# Altium PCB PCB1.PcbDoc (part 1 of 2)
Units mm, origin at the board's own origin, x right, y up, seen from the top; angles counter-clockwise.
Board outline 140 x 77.5 mm, 4 copper layers (Top Layer, GND, PWR, Bottom Layer), stack 1.626 mm thick; 200 components, 149 nets, 661 pads, 125 vias.
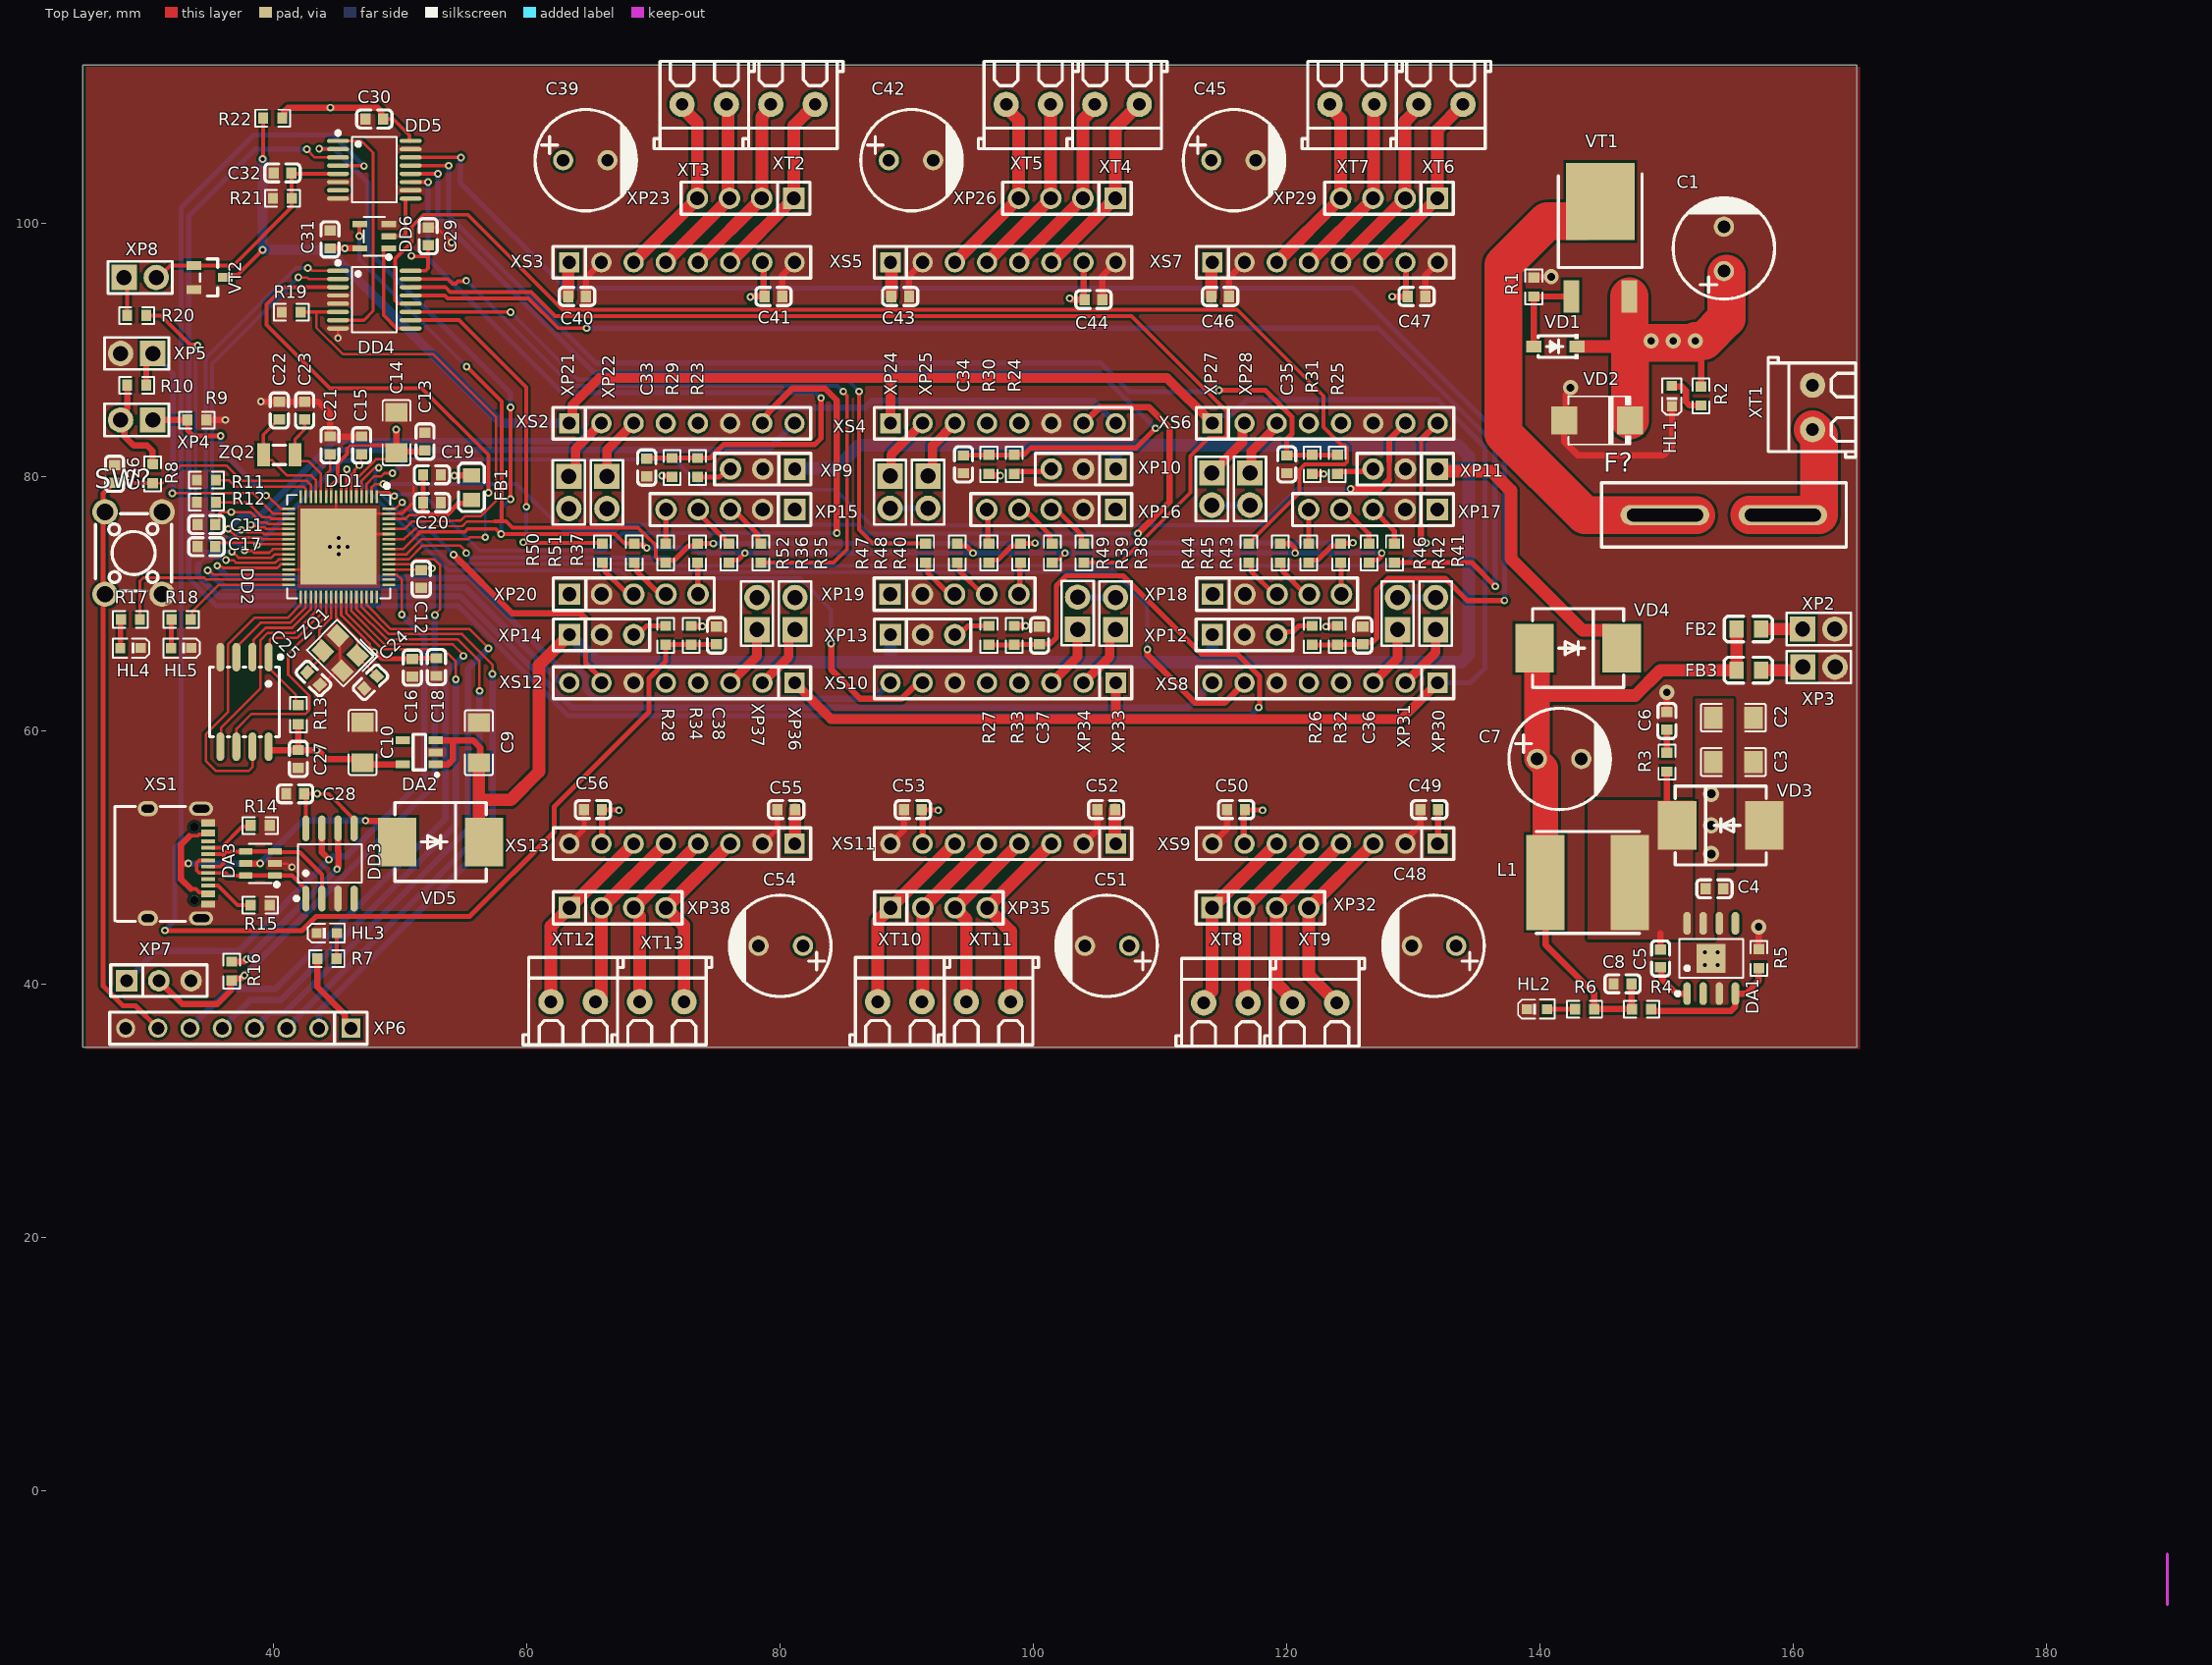
[diagram p0: Top Layer view]
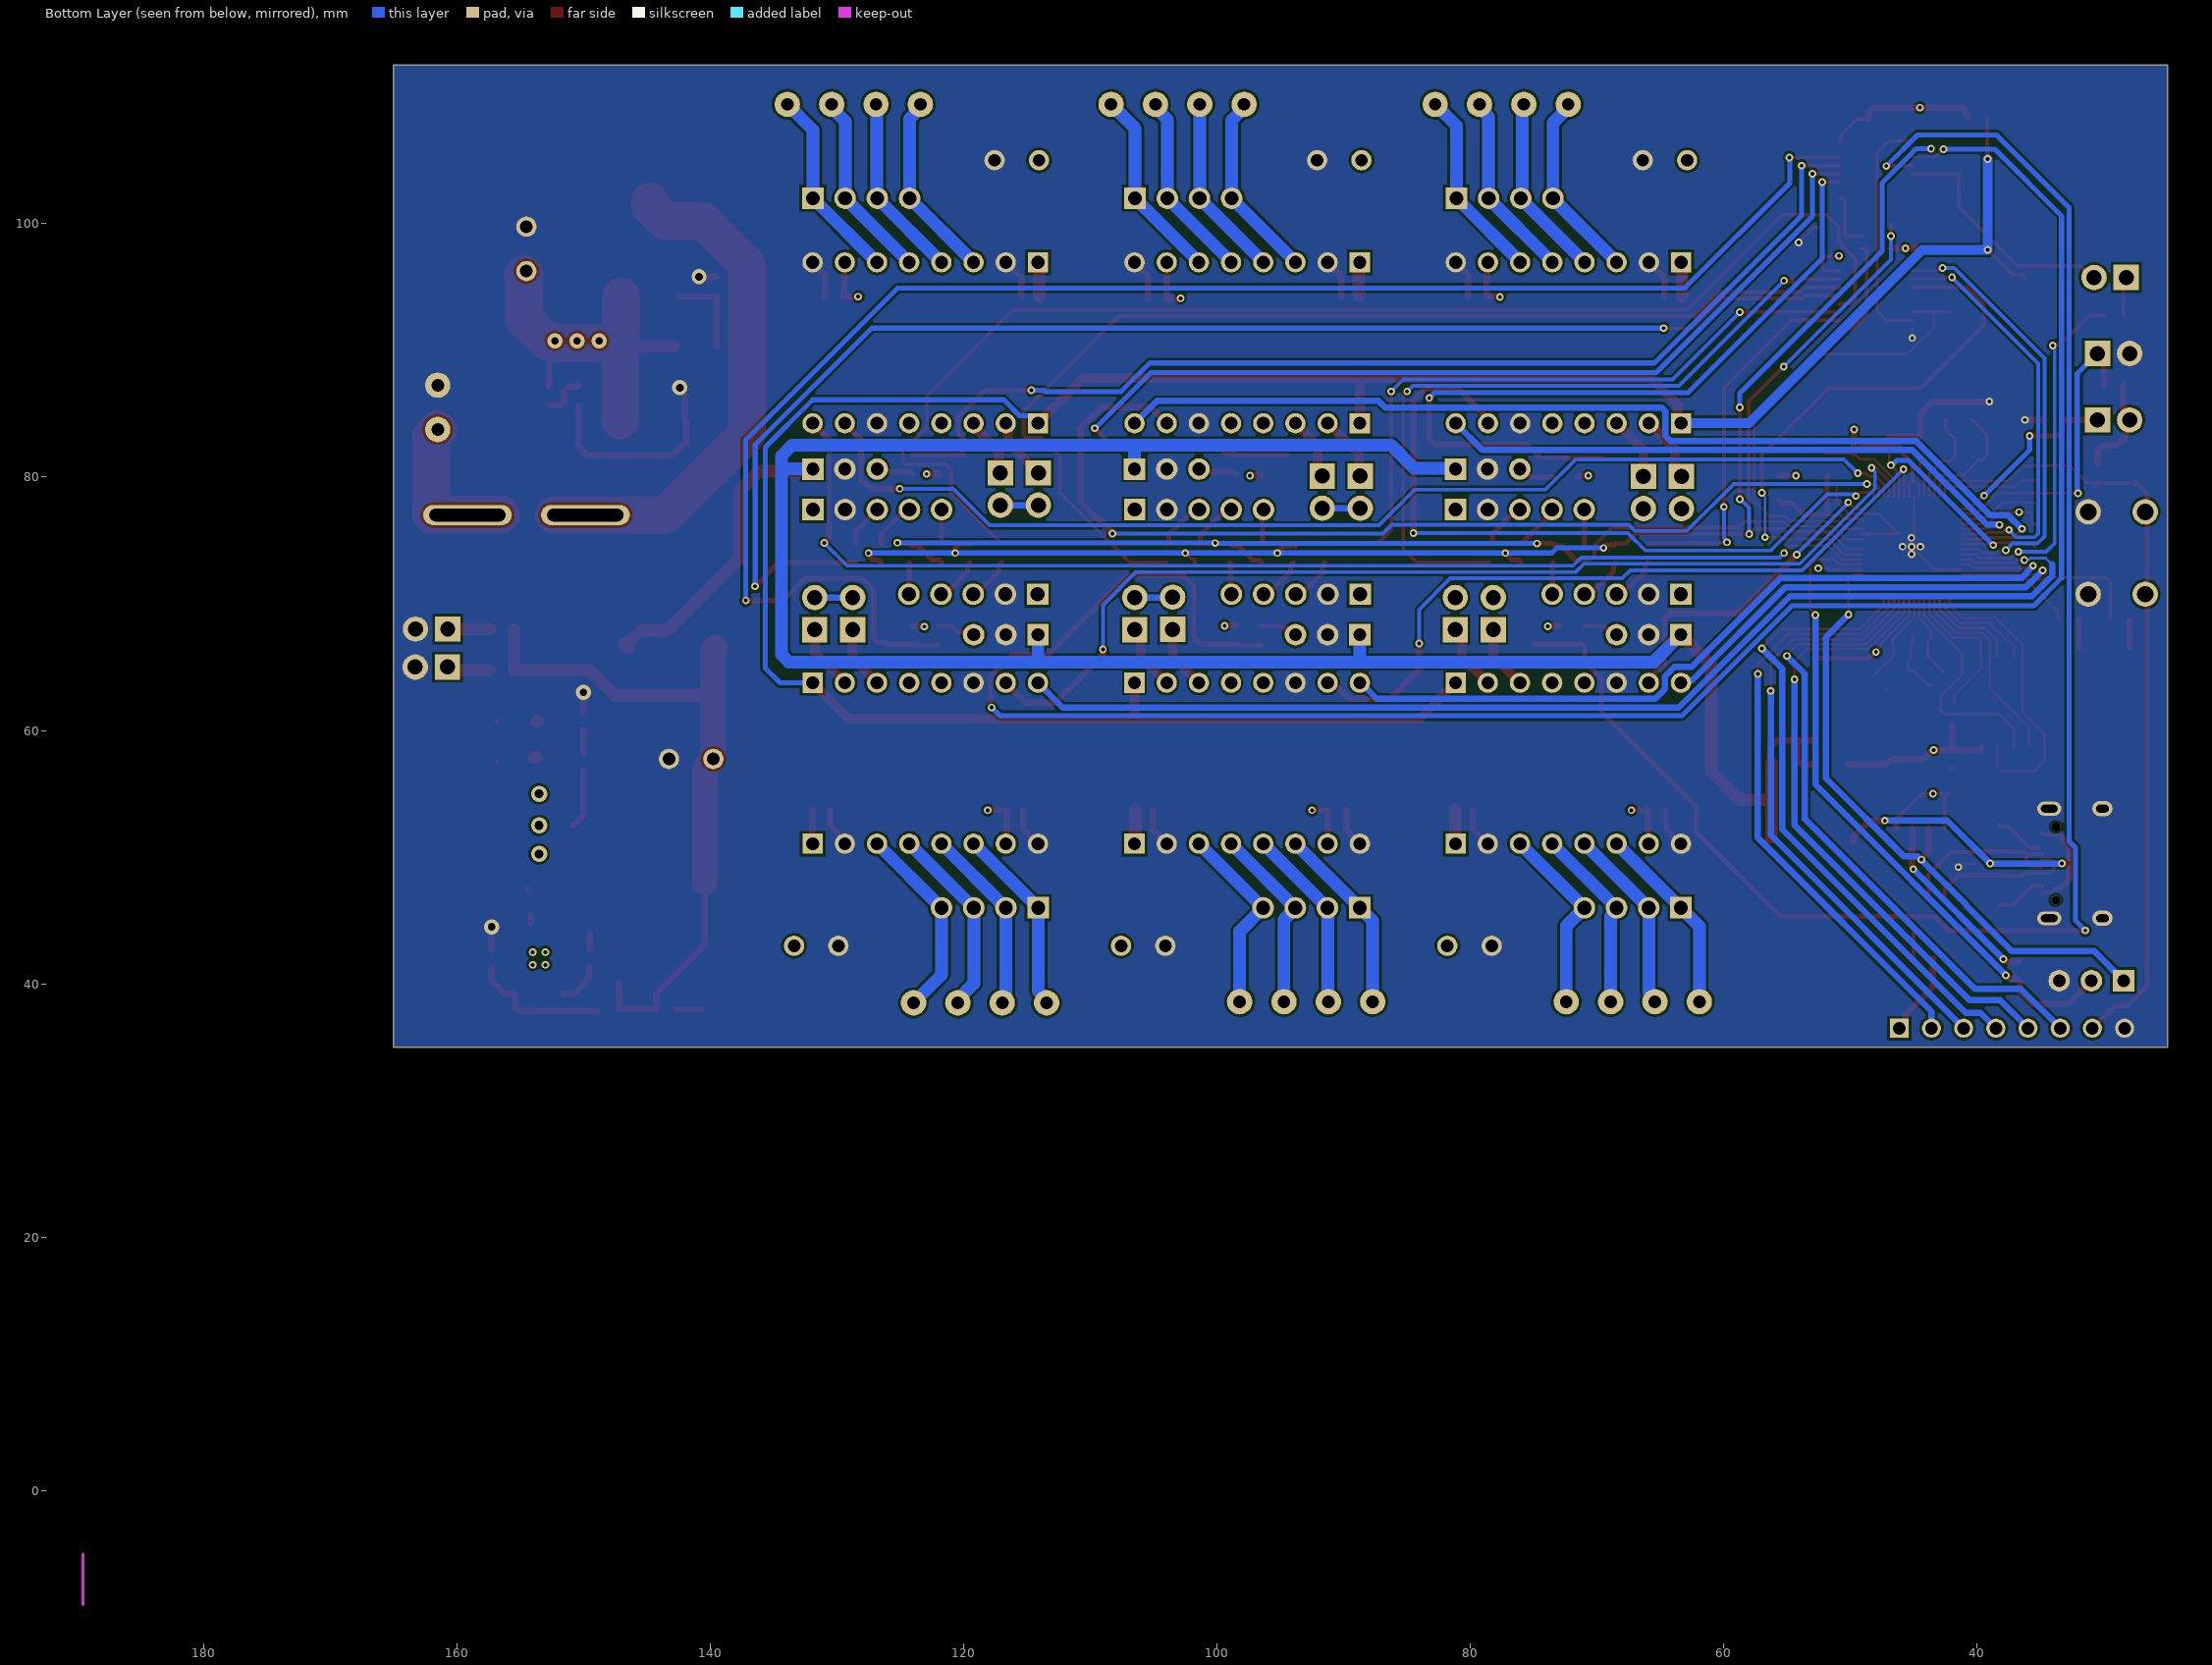
[diagram p1: Bottom Layer view, seen from below]
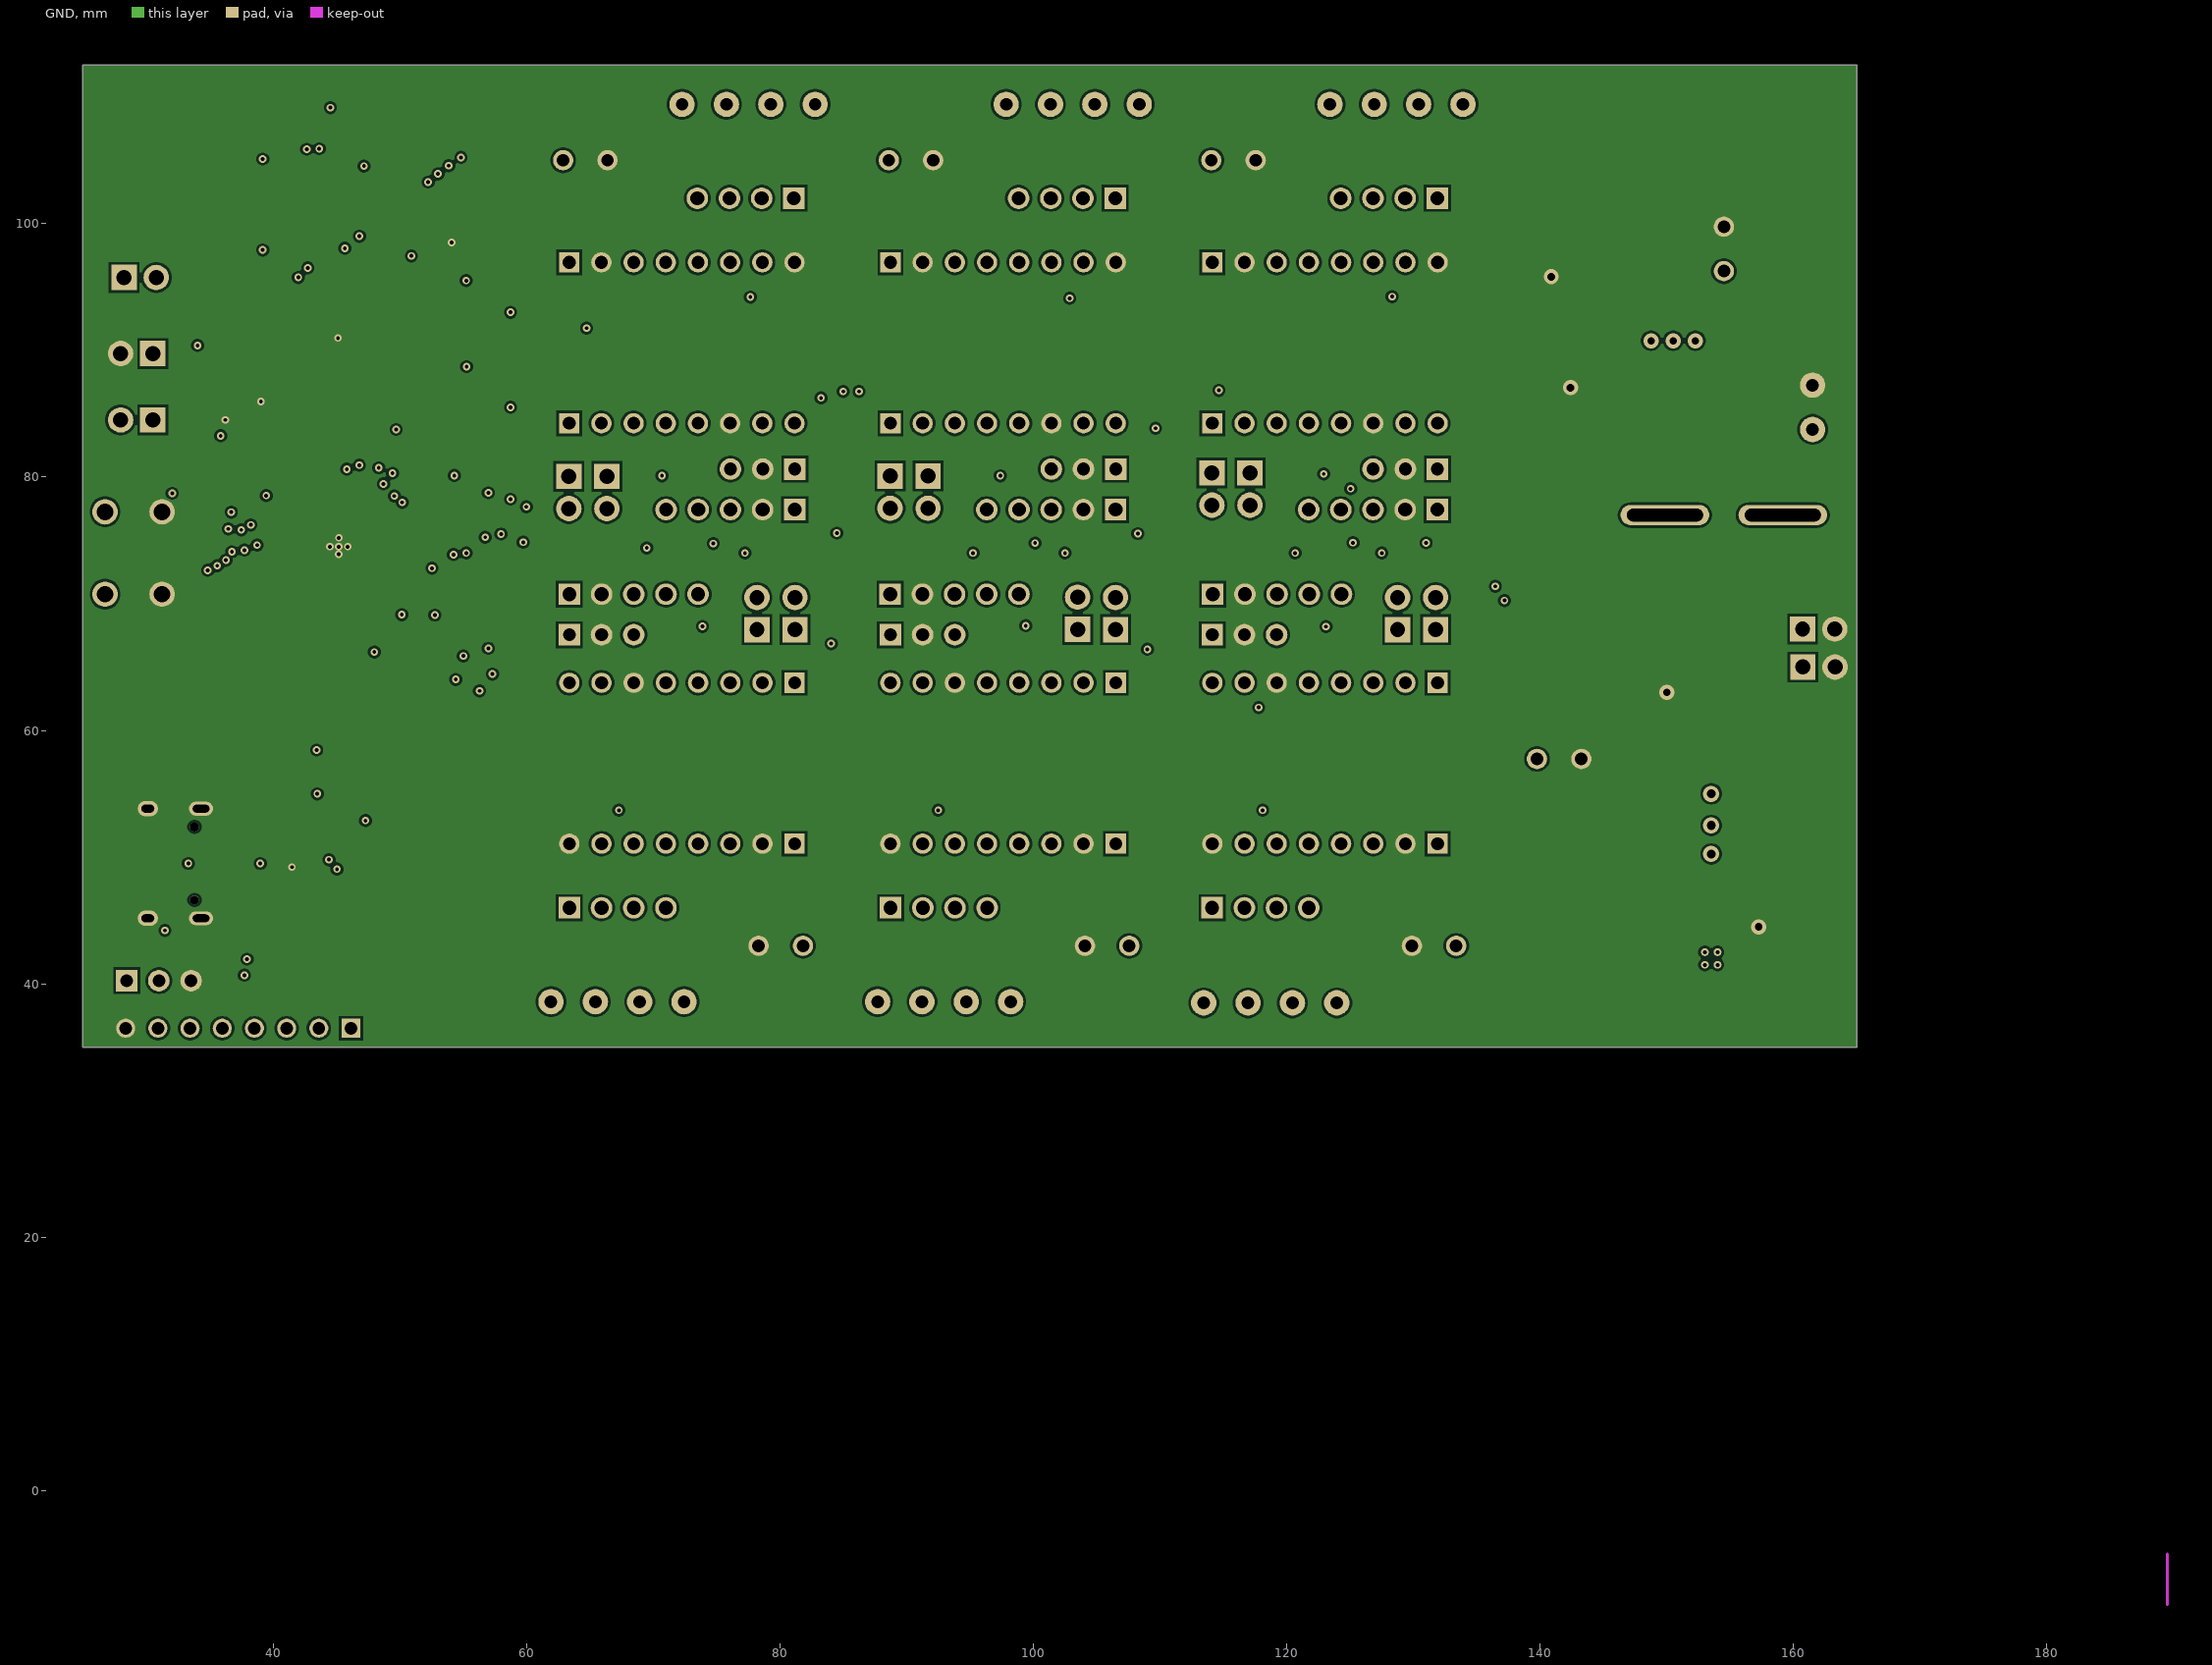
[diagram p2: GND]
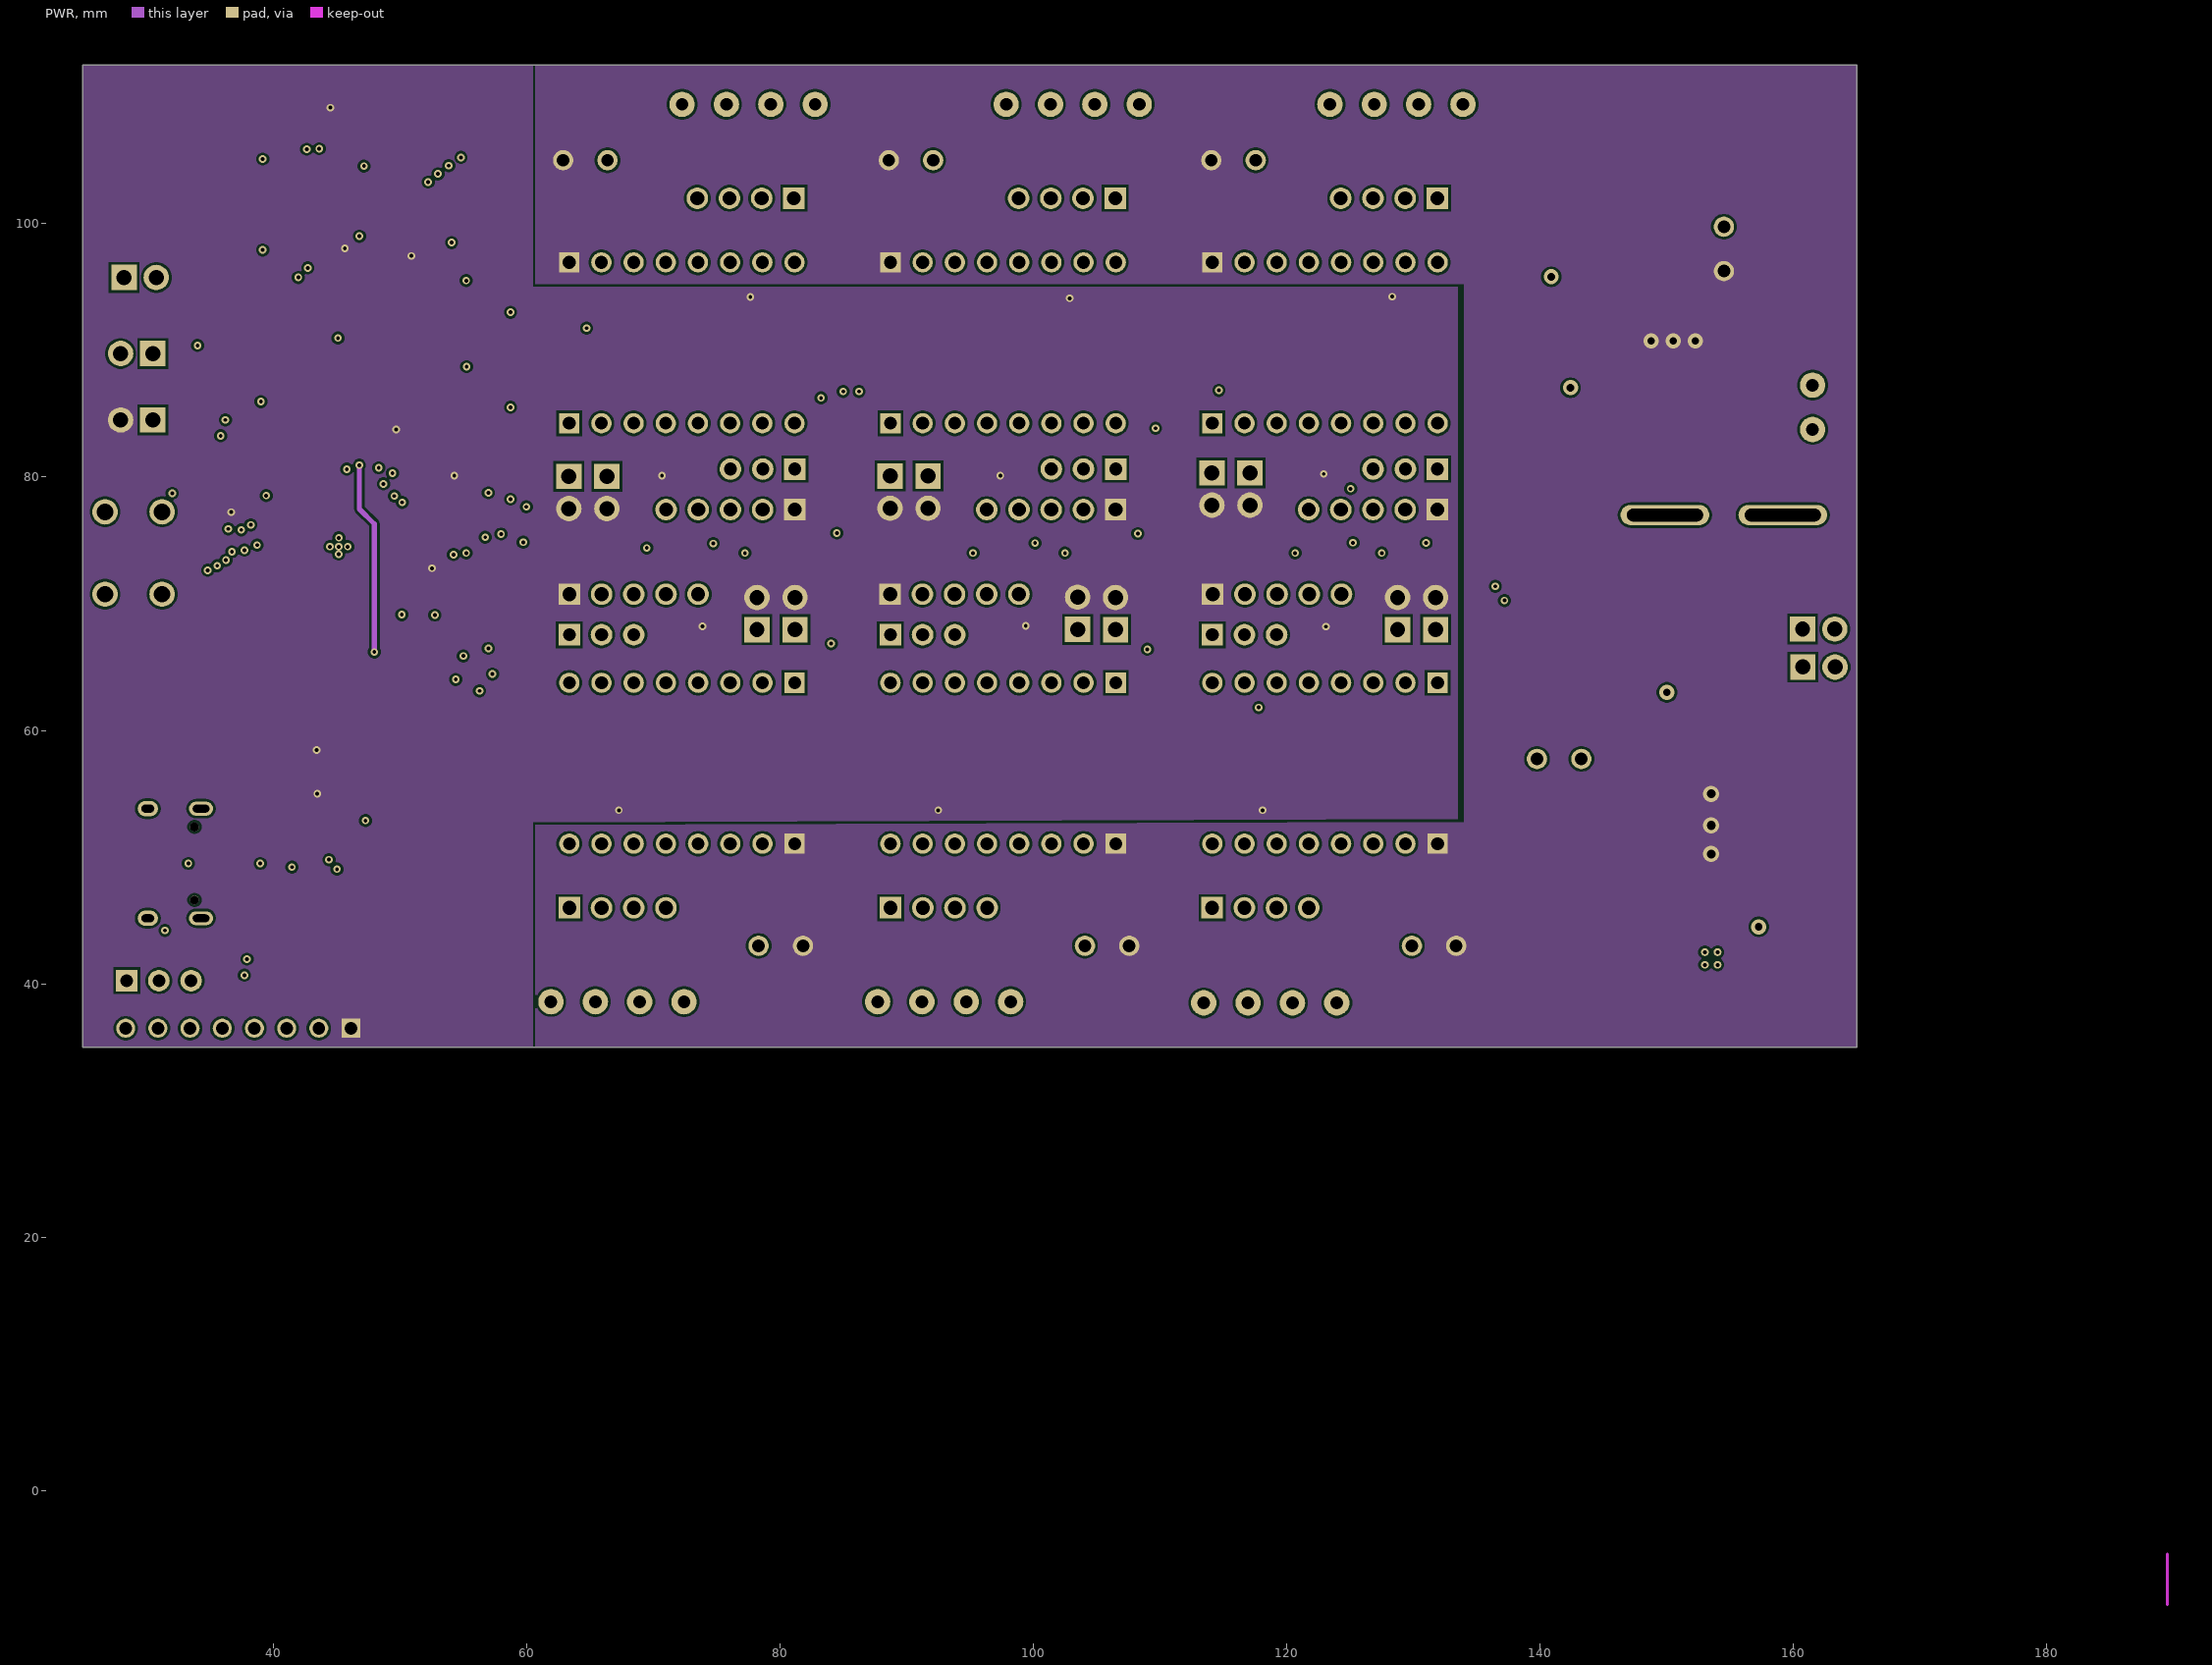
[diagram p3: PWR]
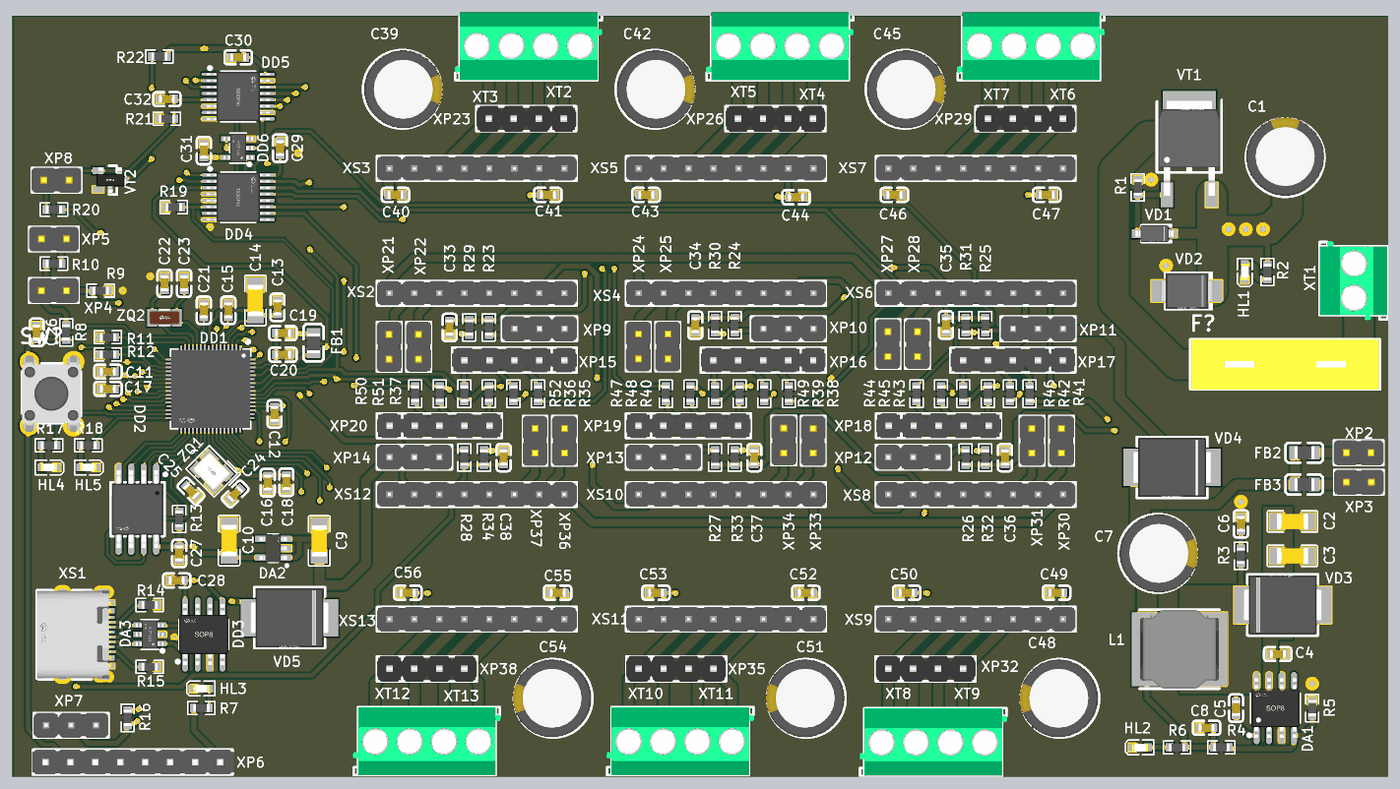
[diagram p5: 3D render of the assembled board from above, using the file's embedded part models]

## Layer stack, top to bottom
Top Solder: solder mask 0.0102, Solder Resist, Dk 3.5
Top Layer: signal copper 0.0356
Dielectric 3: prepreg 0.21, PP-006, Dk 4.1
GND: signal copper 0.035
Dielectric 2: prepreg 1.065, PP-006, Dk 4.1
PWR: signal copper 0.035
Dielectric 1: dielectric 0.21, FR-4, Dk 4.8
Bottom Layer: signal copper 0.0356
Bottom Solder: solder mask 0.0102, Solder Resist, Dk 3.5

## Board outline
25,112.5 165,112.5 165,35 25,35

## Design rules (kind name [scope] priority, off if disabled: settings)
Clearance CL_POWER [InNetClass('PWR24') Or InNetClass('MOTOR')] p1: gap=0.3 ignorepadtopadclearanceinfootprint=TRUE
Clearance [All] p2: gap=0.2 ignorepadtopadclearanceinfootprint=TRUE except(0.1: SMDPad-SMDPad)
ComponentClearance [All] p1: gap=0.25 collisioncheckmode=3 verticalgap=0.254 showdistances=FALSE
DiffPairsRouting [InDifferentialPair('USB')] p1: maxlimit=0.254 minlimit=0.2 mostfreqgap=0.254 toplayer_maxgap=0.2 toplayer_prefgap=0.2 toplayer_minwidth=0.327 toplayer_maxwidth=0.327 toplayer_prefwidth=0.327 impedanceprofiledriven=TRUE impedanceprofileid={DBED7915-1767-4A2F-BF62-6809FCF21FCF} impedanceprofilevalue=90.000000 maxuncoupledlength=12.7
PlaneClearance [All] p1: clearance=0.3
PlaneConnect [All] p1: planeconnectstyle=Direct reliefexpansion=0.25 reliefentries=4 reliefconductorwidth=0.3 reliefairgap=0.25
PolygonConnect [All] p1: connectstyle=Direct reliefconductorwidth=0.254 reliefentries=4 polygonreliefangle="90 Angle" airgapwidth=0.3
RoutingVias [All] p1: holewidth=0.3 width=0.6 viastyle="Through Hole" minholewidth=0.3 minwidth=0.6 maxholewidth=0.3 maxwidth=0.6
SilkToSilkClearance [All] p1: silktosilkclearance=0.01
SilkToSolderMaskClearance [IsPad] p1: minsilkscreentomaskgap=0.1 clearancetoexposedcopper=TRUE
SolderMaskExpansion [All] p1: expansion=0.102 istentingtop=FALSE
SupplyNets "Schematic Supply Nets_5" [InNet('+3V3')] p1: voltage=0.000
SupplyNets "Schematic Supply Nets_4" [InNet('+3V3A')] p2: voltage=0.000
SupplyNets "Schematic Supply Nets_3" [InNet('GND')] p3: voltage=0.000
SupplyNets "Schematic Supply Nets_2" [InNet('+5V')] p4: voltage=0.000
SupplyNets "Schematic Supply Nets_1" [InNet('+24V')] p5: voltage=0.000
SupplyNets "Schematic Supply Nets" [InNet('+5V_DC')] p6: voltage=0.000
Width W_GND [InNet('GND')] p1: maxlimit=2 minlimit=0.2 preferedwidth=0.5
Width W_PWR3 [InNetClass('PWR3')] p2: maxlimit=2 minlimit=0.2 preferedwidth=0.5
Width W_PWR5 [InNetClass('PWR5')] p3: maxlimit=2 minlimit=0.2 preferedwidth=0.8 toplayer_prefwidth=0.5 midlayer1_prefwidth=0.5 midlayer2_minwidth=0.4 bottomlayer_prefwidth=0.5 minimp=50.000000 maximp=50.000000 favimp=50.000000
Width W_MOTOR [InNetClass('MOTOR')] p4: maxlimit=2 minlimit=0.4 preferedwidth=1 midlayer2_minwidth=1 minimp=50.000000 maximp=50.000000 favimp=50.000000
Width W_PWR24 [InNetClass('PWR24')] p5: maxlimit=6 minlimit=0.4 preferedwidth=3 midlayer2_minwidth=1 minimp=50.000000 maximp=50.000000 favimp=50.000000
Width [All] p6: maxlimit=2 minlimit=0.2 preferedwidth=0.4 midlayer2_maxwidth=0.254 midlayer2_prefwidth=0.254 minimp=50.000000 maximp=50.000000 favimp=50.000000
24 further rules are at their usual default settings.

## Classes and differential pairs
component class 4_Drivers: C39 C40 C41 C42 C43 C44 C45 C46 C47 C48 C49 C50 C51 C52 C53 C54 C55 C56 XP21 XP22 XP23 XP24 XP25 XP26 XP27 XP28 XP29 XP30 XP31 XP32 XP33 XP34 XP35 XP36 XP37 XP38 XS2 XS3 XS4 XS5 XS6 XS7 XS8 XS9 XS10 XS11 XS12 XS13 XT2 XT3 XT4 XT5 XT6 XT7 XT8 XT9 XT10 XT11 XT12 XT13
component class 3_IO: C29 C30 C31 C32 C33 C34 C35 C36 C37 C38 DD4 DD5 DD6 R19 R20 R21 R22 R23 R24 R25 R26 R27 R28 R29 R30 R31 R32 R33 R34 R35 R36 R37 R38 R39 R40 R41 R42 R43 R44 R45 R46 R47 R48 R49 R50 R51 R52 VT2 XP8 XP9 XP10 XP11 XP12 XP13 XP14 XP15 XP16 XP17 XP18 XP19 XP20
component class 2_MCU: C11 C12 C13 C14 C15 C16 C17 C18 C19 C21 C22 C23 C24 C25 C26 C27 C28 DA3 DD1 DD2 DD3 HL4 HL5 R8 R9 R10 R11 R12 R13 R14 R15 R16 R17 R18 SW? XP4 XP5 XP6 XP7 XS1 ZQ1 ZQ2
component class 1_Power: C1 C2 C3 C4 C5 C6 C7 C8 C9 C10 DA1 DA2 F? FB1 FB2 FB3 HL1 HL2 HL3 L1 R1 R2 R3 R4 R5 R6 R7 VD1 VD2 VD3 VD4 VD5 VT1 XP2 XP3 XT1

## Components (designator, comment, footprint, x,y, rotation, side; value= is the part's Value field where it differs from the comment)
C1 "220u 35V" CAP-TH_BD8.0-P3.50-D0.5-FD 154.5,98 r90 top value=220uF
C2 "4.7u 50V" C1206 155.25,61 r0 top value=4.7uF
C3 "4.7u 50V" C1206 155.25,57.5 r0 top value=4.7uF
C4 "100n" C0603 153.75,47.5 r0 top
C5 "10n" C0603 149.5,42 r270 top
C6 "330p" C0603 150,60.75 r90 top
C7 "220u 35V" CAP-TH_BD8.0-P3.50-D0.5-FD 141.5,57.75 r0 top value=220uF
C8 "100n" C0603 146.5,40 r180 top
C9 "4.7u 50V" C1206 56.25,59.025 r90 top value=4.7uF
C10 "4.7u 50V" C1206 47.075,59.05 r90 top value=4.7uF
C11 "100n" C0603 34.75,76.25 r180 top
C12 "100n" C0603 51.7,71.95 r270 top
C13 "100n" C0603 52,82.8 r90 top
C14 "4.7u 50V" C1206 49.75,83.5 r90 top value=4.7uF
C15 "100n" C0603 47,82.5 r90 top
C16 "100n" C0603 51,64.95 r270 top
C17 "100n" C0603 34.75,74.5 r180 top
C18 "1u" C0603 52.9,65 r270 top
C19 "100n" C0603 52.55,80.175 r0 top
C20 "1u" C0603 52.55,77.975 r0 top
C21 "100n" C0603 44.5,82.5 r90 top
C22 "18p" C0603 40.5,85.25 r90 top
C23 "18p" C0603 42.5,85.25 r90 top
C24 "18p" C0603 47.7,63.8 r225 top
C25 "18p" C0603 43.2,64.1 r315 top
C26 "100n" C0603 27.5,80.25 r90 top
C27 "100n" C0603 42,57.75 r270 top
C28 "100n" C0603 41.75,55 r180 top
C29 "100n" C0603 52.25,99 r90 top
C30 "100n" C0603 48,108.25 r180 top
C31 "100n" C0603 44.5,98.75 r90 top
C32 "100n" C0603 40.75,104 r180 top
C33 "100n" C0603 69.5,80.75 r270 top
C34 "100n" C0603 94.5,80.995 r270 top
C35 "100n" C0603 120,81 r270 top
C36 "100n" C0603 126,67.5 r90 top
C37 "100n" C0603 100.5,67.5 r90 top
C38 "100n" C0603 75,67.5 r90 top
C39 "220u 35V" CAP-TH_BD8.0-P3.50-D0.5-FD 64.65,105 r0 top value=220uF
C40 "100n" C0603 64,94.25 r0 top
C41 "100n" C0603 79.5,94.25 r0 top
C42 "220u 35V" CAP-TH_BD8.0-P3.50-D0.5-FD 90.35,105 r0 top value=220uF
C43 "100n" C0603 89.5,94.25 r0 top
C44 "100n" C0603 104.75,94 r0 top
C45 "220u 35V" CAP-TH_BD8.0-P3.50-D0.5-FD 115.8,105 r0 top value=220uF
C46 "100n" C0603 114.75,94.25 r0 top
C47 "100n" C0603 130.25,94.25 r0 top
C48 "220u 35V" CAP-TH_BD8.0-P3.50-D0.5-FD 131.625,43 r180 top value=220uF
C49 "100n" C0603 131.25,53.75 r180 top
C50 "100n" C0603 116,53.75 r180 top
C51 "220u 35V" CAP-TH_BD8.0-P3.50-D0.5-FD 105.825,43 r180 top value=220uF
C52 "100n" C0603 105.75,53.75 r180 top
C53 "100n" C0603 90.5,53.75 r180 top
C54 "220u 35V" CAP-TH_BD8.0-P3.50-D0.5-FD 80.075,43 r180 top value=220uF
C55 "100n" C0603 80.5,53.75 r180 top
C56 "100n" C0603 65.25,53.75 r180 top
DA1 "TPS5450DDAR" SOP-8_L4.9-W3.9-P1.27-LS6.0-BL-EP 153.5,42 r0 top
DA2 "AP2112K-3.3" SOT-25-5_L2.9-W1.6-P0.95-LS2.8-BL 51.55,58.275 r90 top
DA3 "USBLC6-2SC6" SOT-23-6_L2.9-W1.6-P0.95-LS2.8-BL 39,49.5 r90 top
DD1 "MIK32 АМУР К1948ВК018" QFN-64_MCU32_PROD 45.187,74.5 r270 top
DD2 "W25Q32JVSSIQ" SOIC-8_L5.2-W5.2-P1.27-LS7.9-BL 37.75,62.25 r180 top
DD3 "CH340N" SOP-8_L5.0-W4.0-P1.27-LS6.0-BL 44.5,49.5 r0 top
DD4 "74HC138PW" TSSOP-16_L5.0-W4.4-P0.65-LS6.4-BL 48,94 r270 top
DD5 "74HC165PW" TSSOP-16_L5.0-W4.4-P0.65-LS6.4-BL 48,104.25 r270 top
DD6 "74LVC1G125" SOT-23-5_L3.0-W1.7-P0.95-LS2.8-BL 48,99 r90 top
F? "0287010.PXCN" FUSE-TH_L19.1-W5.1 154.5,77 r180 top
FB1 "220R" L0805 55.663,79.152 r270 top value=220Ω
FB2 "220R" L0805 156.466,68 r0 top value=220Ω
FB3 "220R" L0805 156.466,64.75 r0 top value=220Ω
HL1 "24V" LED0603-RD_GREEN 150.4,86.4 r90 top
HL2 "5V" LED0603-RD_GREEN 139.75,38 r0 top
HL3 "3.3V" LED0603-RD_GREEN 44.25,44 r0 top
HL4 "RUN" LED0603-RD_GREEN 28.75,66.5 r180 top
HL5 "ERR" LED0603-RD_GREEN 32.75,66.5 r180 top
L1 "22u" IND-SMD_L8.0-W8.0 143.75,48 r0 top value=22uH
R1 "10k" R0603 139.5,95 r90 top value=10kΩ
R2 "10k" R0603 152.7,86.4 r270 top value=10kΩ
R3 "5.6" R0603 150,57.5 r90 top value=10kΩ
R4 "10k" R0603 148,38 r0 top value=10kΩ
R5 "3.3k" R0603 157.25,42 r90 top value=10kΩ
R6 "1k" R0603 143.5,38 r180 top value=10kΩ
R7 "1k" R0603 44.25,42 r0 top value=10kΩ
R8 "10k" R0603 30.5,80.25 r90 top value=10kΩ
R9 "10k" R0603 34.003,84.5 r0 top value=10kΩ
R10 "10k" R0603 29.25,87.25 r180 top value=10kΩ
R11 "10k" R0603 34.75,79.75 r180 top value=10kΩ
R12 "10k" R0603 34.75,78 r180 top value=10kΩ
R13 "10k" R0603 42,61.25 r270 top value=10kΩ
R14 "5.1k" R0603 39,52.5 r0 top value=10kΩ
R15 "5.1k" R0603 39,46.2 r0 top value=10kΩ
R16 "1k" R0603 36.75,41.003 r270 top value=10kΩ
R17 "1k" R0603 28.75,68.75 r180 top value=10kΩ
R18 "1k" R0603 32.753,68.75 r180 top value=10kΩ
R19 "10k" R0603 41.447,93 r180 top value=10kΩ
R20 "1k" R0603 29.25,92.75 r180 top value=10kΩ
R21 "10k" R0603 40.75,102 r180 top value=10kΩ
R22 "10k" R0603 39.981,108.327 r0 top value=10kΩ
R23 "1k" R0603 73.5,80.75 r90 top value=10kΩ
R24 "1k" R0603 98.5,80.995 r90 top value=10kΩ
R25 "1k" R0603 124,81 r90 top value=10kΩ
R26 "1k" R0603 122,67.5 r270 top value=10kΩ
R27 "1k" R0603 96.5,67.5 r270 top value=10kΩ
R28 "1k" R0603 71,67.5 r270 top value=10kΩ
R29 "10k" R0603 71.5,80.75 r270 top value=10kΩ
R30 "10k" R0603 96.5,80.995 r270 top value=10kΩ
R31 "10k" R0603 122,81 r270 top value=10kΩ
R32 "10k" R0603 124,67.5 r90 top value=10kΩ
R33 "10k" R0603 98.5,67.5 r90 top value=10kΩ
R34 "10k" R0603 73,67.5 r90 top value=10kΩ
R35 "1k" R0603 78.5,74 r270 top value=10kΩ
R36 "1k" R0603 76,74 r270 top value=10kΩ
R37 "1k" R0603 71,74 r270 top value=10kΩ
R38 "1k" R0603 104,74 r270 top value=10kΩ
R39 "1k" R0603 101.5,74 r270 top value=10kΩ
R40 "1k" R0603 96.5,74 r270 top value=10kΩ
R41 "1k" R0603 128.5,74 r270 top value=10kΩ
R42 "1k" R0603 126.5,74 r270 top value=10kΩ
R43 "1k" R0603 121.75,74 r270 top value=10kΩ
R44 "1k" R0603 117,74 r90 top value=10kΩ
R45 "1k" R0603 119.5,74 r90 top value=10kΩ
R46 "1k" R0603 124.25,74 r90 top value=10kΩ
R47 "1k" R0603 91.5,74 r90 top value=10kΩ
R48 "1k" R0603 94,74 r90 top value=10kΩ
R49 "1k" R0603 99,74 r90 top value=10kΩ
R50 "1k" R0603 66,74 r90 top value=10kΩ
R51 "1k" R0603 68.5,74 r90 top value=10kΩ
R52 "1k" R0603 73.5,74 r90 top value=10kΩ
SW? "K2-1102DP-C4SW-04" KEY-TH_4P-L6.0-W6.0-P4.50-LS6.50 29,74 r90 top
VD1 "BZT52C12" SOD-123_L2.7-W1.6-LS3.7-RD-1 141.2,90.3 r180 top
VD2 "SMBJ24A" SMB_L4.3-W3.6-LS5.4-RD 144.503,84.463 r180 top
VD3 "SK86" SMC_L7.1-W6.2-LS8.1-R-RD 154.25,52.5 r0 top
VD4 "SK86" SMC_L7.1-W6.2-LS8.1-R-RD 143,66.5 r180 top
VD5 "SK86" SMC_L7.1-W6.2-LS8.1-R-RD 53.225,51.2 r180 top
VT1 "AOD4185" TO-252-3_L6.5-W5.8-P4.58-BL 144.75,98 r0 top
VT2 "SI2302" SOT-23-3_L2.9-W1.3-P1.90-LS2.4-BR-CW 35,95.75 r180 top
XP2 "FAN1" HDR-TH_2P-P2.54-V-M 161.98,68 r0 top
XP3 "FAN2" HDR-TH_2P-P2.54-V-M 162,65 r0 top
XP4 "BOOT0" HDR-TH_2P-P2.54-V-M 29.25,84.5 r180 top
XP5 "BOOT1" HDR-TH_2P-P2.54-V-M 29.25,89.75 r180 top
XP6 "JTAG" HDR-TH_8P-P2.54-V-M 37.27,36.5 r180 top
XP7 "UART" HDR-TH_3P-P2.54-V-M_PZ254V-11-03P 31,40.25 r0 top
XP8 "E-STOP" HDR-TH_2P-P2.54-V-M 29.52,95.75 r0 top
XP9 "LIM1" HDR-TH_3P-P2.54-V-M_PZ254V-11-03P 78.65,80.625 r180 top
XP10 "LIM2" HDR-TH_3P-P2.54-V-M_PZ254V-11-03P 103.965,80.625 r180 top
XP11 "LIM3" HDR-TH_3P-P2.54-V-M_PZ254V-11-03P 129.36,80.625 r180 top
XP12 "LIM4" HDR-TH_3P-P2.54-V-M_PZ254V-11-03P 116.667,67.55 r0 top
XP13 "LIM5" HDR-TH_3P-P2.54-V-M_PZ254V-11-03P 91.265,67.55 r0 top
XP14 "LIM6" HDR-TH_3P-P2.54-V-M_PZ254V-11-03P 65.931,67.55 r0 top
XP15 "ENC1" HDR-TH_5P-P2.54-V-M 76.1,77.425 r180 top
XP16 "ENC2" HDR-TH_5P-P2.54-V-M 101.413,77.425 r180 top
XP17 "ENC3" HDR-TH_5P-P2.54-V-M 126.81,77.425 r180 top
XP18 "ENC4" HDR-TH_5P-P2.54-V-M 119.242,70.75 r0 top
XP19 "ENC5" HDR-TH_5P-P2.54-V-M 93.79,70.75 r0 top
XP20 "ENC6" HDR-TH_5P-P2.54-V-M 68.473,70.75 r0 top
XP21 "MS1" HDR-TH_2P-P2.54-V-M 63.35,78.78 r270 top
XP22 "MS2" HDR-TH_2P-P2.54-V-M 66.35,78.78 r270 top
XP23 "M1" HDR-TH_4P-P2.54-V-M 77.3,102 r180 top
XP24 "MS1" HDR-TH_2P-P2.54-V-M 88.697,78.803 r270 top
XP25 "MS2" HDR-TH_2P-P2.54-V-M 91.697,78.803 r270 top
XP26 "M2" HDR-TH_4P-P2.54-V-M 102.655,102 r180 top
XP27 "MS1" HDR-TH_2P-P2.54-V-M 114.1,79.05 r270 top
XP28 "MS2" HDR-TH_2P-P2.54-V-M 117.1,79.05 r270 top
XP29 "M3" HDR-TH_4P-P2.54-V-M 128.075,102 r180 top
XP30 "MS1" HDR-TH_2P-P2.54-V-M 131.75,69.22 r90 top
XP31 "MS2" HDR-TH_2P-P2.54-V-M 128.75,69.22 r90 top
XP32 "M4" HDR-TH_4P-P2.54-V-M 117.925,46 r0 top
XP33 "MS1" HDR-TH_2P-P2.54-V-M 106.488,69.22 r90 top
XP34 "MS2" HDR-TH_2P-P2.54-V-M 103.5,69.25 r90 top
XP35 "M5" HDR-TH_4P-P2.54-V-M 92.55,46 r0 top
XP36 "MS1" HDR-TH_2P-P2.54-V-M 81.196,69.22 r90 top
XP37 "MS2" HDR-TH_2P-P2.54-V-M 78.196,69.22 r90 top
XP38 "M6" HDR-TH_4P-P2.54-V-M 67.2,46 r0 top
XS1 "USB-C" USB-C-SMD_TYPE-C-16PIN-2MD-073 32.5,49.5 r270 top
XS2 "DRV1 логика" HDR-TH_PZ254V-11-08P-A40 72.27,84.24 r0 top
XS3 "DRV1 силовые" HDR-TH_PZ254V-11-08P-A40 72.27,96.94 r0 top
XS4 "DRV2 логика" HDR-TH_PZ254V-11-08P-A40 97.62,84.24 r0 top
XS5 "DRV2 силовые" HDR-TH_PZ254V-11-08P-A40 97.62,96.94 r0 top
XS6 "DRV3 логика" HDR-TH_PZ254V-11-08P-A40 123.02,84.24 r0 top
XS7 "DRV3 силовые" HDR-TH_PZ254V-11-08P-A40 123.02,96.94 r0 top
XS8 "DRV4 логика" HDR-TH_PZ254V-11-08P-A40 123.02,63.76 r180 top
XS9 "DRV4 силовые" HDR-TH_PZ254V-11-08P-A40 123.02,51.06 r180 top
XS10 "DRV5 логика" HDR-TH_PZ254V-11-08P-A40 97.62,63.76 r180 top
XS11 "DRV5 силовые" HDR-TH_PZ254V-11-08P-A40 97.62,51.06 r180 top
XS12 "DRV6 логика" HDR-TH_PZ254V-11-08P-A40 72.28,63.76 r180 top
XS13 "DRV6 силовые" HDR-TH_PZ254V-11-08P-A40 72.28,51.06 r180 top
XT1 "24V IN" CONN-TH_P3.50_KF350-3.5-2P 161.5,85.5 r90 top
XT2 "M1 A" CONN-TH_P3.50_KF350-3.5-2P 81.035,109.41 r180 top
XT3 "M1 B" CONN-TH_P3.50_KF350-3.5-2P 74.035,109.41 r180 top
XT4 "M2 A" CONN-TH_P3.50_KF350-3.5-2P 106.61,109.41 r180 top
XT5 "M2 B" CONN-TH_P3.50_KF350-3.5-2P 99.61,109.41 r180 top
XT6 "M3 A" CONN-TH_P3.50_KF350-3.5-2P 132.16,109.41 r180 top
XT7 "M3 B" CONN-TH_P3.50_KF350-3.5-2P 125.16,109.41 r180 top
XT8 "M4 A" CONN-TH_P3.50_KF350-3.5-2P 115.2,38.5 r0 top
XT9 "M4 B" CONN-TH_P3.50_KF350-3.5-2P 122.2,38.5 r0 top
XT10 "M5 A" CONN-TH_P3.50_KF350-3.5-2P 89.465,38.59 r0 top
XT11 "M5 B" CONN-TH_P3.50_KF350-3.5-2P 96.465,38.59 r0 top
XT12 "M6 A" CONN-TH_P3.50_KF350-3.5-2P 63.69,38.59 r0 top
XT13 "M6 B" CONN-TH_P3.50_KF350-3.5-2P 70.69,38.59 r0 top
ZQ1 "32 MHz" CRYSTAL-SMD_4P-L3.2-W2.5-BL 45.3,66.1 r135 top value=32MHz
ZQ2 "32.768 kHz" FC-135R_L3.2-W1.5 40.5,81.75 r0 top value=32.768kHz

## Footprints (in the part's own frame and the unit in brackets; to place one, negate y for a bottom-side part, rotate by r counter-clockwise, add the part's x,y. Pads: shape width x height; smd on the part's side, far side on the other; paste and mask are expansions set on the pad)
C0603 [mm]
  rect 0.8x0.9 smd: 1(-0.7,0) 2(0.7,0)
  silkscreen extent -1.39,-0.71 1.39,0.71, body extent -0.8,-0.4 0.8,0.4, height 0.8
C1206 [mm] "4.7uF (475) ±10% 50V"
  rect 1.485x1.728 smd: 1(-1.593,0) 2(1.593,0)
  silkscreen extent -2.56,-1.09 2.56,1.09, body extent -1.6,-0.8 1.6,0.8, height 1.3
CAP-TH_BD8.0-P3.50-D0.5-FD [mm]
  round 1.6 hole 1: 1(-1.75,0) 2(1.75,0)
  silkscreen extent -3.96,-4 4.04,4, body extent -3.85,-4 3.85,4, height 12.01
CONN-TH_P3.50_KF350-3.5-2P [mm]
  round 2 hole 1: 1(-1.75,0) 2(1.75,0)
  silkscreen extent -3.95,-3.4 3.95,3.5, body extent -4,-3.4 4,3.5, height 8.8
CRYSTAL-SMD_4P-L3.2-W2.5-BL [mm] "YSX321SL 32MHZ 12PF 10PPM -40~+85"
  rect 1.4x1.2 smd: 1(-1.1,-0.85) 2(1.1,-0.85) 3(1.1,0.85) 4(-1.1,0.85)
  silkscreen extent -2.26,-1.91 2.03,1.68, body extent -1.6,-1.25 1.6,1.25, height 0.7
FC-135R_L3.2-W1.5 [mm] "32.768KHz ±20ppm 12.5pF"
  rect 1x1.8 smd: 1(-1.25,0) 2(1.25,0)
  silkscreen extent -0.51,-0.76 0.51,0.76, body extent -1.6,-0.75 1.6,0.75, height 0.8
FUSE-TH_L19.1-W5.1 [mm]
  oval 7x1.6 hole 1 slot 6 at 0 deg: 1(-4.65,0) 2(4.65,0)
  silkscreen extent -9.65,-2.54 9.65,2.54, body extent -9.55,-2.55 9.55,2.55, height 11.8
HDR-TH_2P-P2.54-V-M [mm]
  rect 2x2 hole 1.2: 1(-1.27,0)
  round 2 hole 1.2: 2(1.27,0)
  silkscreen extent -2.54,-1.27 2.54,1.27, body extent -2.55,-1.27 2.55,1.27, height 8.5
HDR-TH_3P-P2.54-V-M_PZ254V-11-03P [mm]
  rect 1.7x1.7 hole 1.02: 1(-2.54,0)
  round 1.7 hole 1.02: 2(0,0) 3(2.54,0)
  silkscreen extent -3.81,-1.25 3.81,1.25, body extent -3.82,-1.27 3.81,1.27, height 8.5
HDR-TH_4P-P2.54-V-M [mm]
  rect 1.7x1.7 hole 1.1: 1(-3.81,0)
  round 1.7 hole 1.1: 2(-1.27,0) 3(1.27,0) 4(3.81,0)
  silkscreen extent -5.08,-1.27 5.08,1.27, body extent -5.09,-1.33 5.09,1.33, height 8.54
HDR-TH_5P-P2.54-V-M [mm]
  rect 1.7x1.7 hole 1.1: 1(-5.08,0)
  round 1.7 hole 1.1: 2(-2.54,0) 3(0,0) 4(2.54,0) 5(5.08,0)
  silkscreen extent -6.35,-1.27 6.35,1.27, body extent -6.35,-1.27 6.36,1.27, height 8.54
HDR-TH_8P-P2.54-V-M [mm]
  rect 1.5x1.5 hole 1: 1(-8.89,0)
  round 1.5 hole 1: 2(-6.35,0) 3(-3.81,0) 4(-1.27,0) 5(1.27,0) 6(3.81,0) 7(6.35,0) 8(8.89,0)
  silkscreen extent -10.16,-1.27 10.16,1.27, body extent -10.27,-1.25 10.26,1.25, height 8.5
HDR-TH_PZ254V-11-08P-A40 [mm]
  rect 1.6x1.6 hole 1.02: 1(-8.89,0)
  round 1.6 hole 1.02: 2(-6.35,0) 3(-3.81,0) 4(-1.27,0) 5(1.27,0) 6(3.81,0) 7(6.35,0) 8(8.89,0)
  silkscreen extent -10.16,-1.25 10.16,1.25, body extent -10.17,-1.25 10.17,1.25, height 6.5
IND-SMD_L8.0-W8.0 [mm] "22uH ±20%"
  rect 3.024x7.5 smd: 1(3.328,0) 2(-3.328,0)
  silkscreen extent -4.08,-4.02 4.08,4.02, body extent -4,-4 4,4, height 4.21
KEY-TH_4P-L6.0-W6.0-P4.50-LS6.50 [mm]
  round 2 hole 1.3: 1(-3.25,2.25) 2(3.25,2.25) 3(-3.25,-2.25) 4(3.25,-2.25)
  silkscreen extent -3,-3 3.1,3, body extent -3.88,-3 3.88,3, height 6
L0805 [mm] "220Ohm ±25% @100MHz 2A"
  rect 1.133x1.377 smd: 1(-0.966,0) 2(0.966,0)
  silkscreen extent -1.95,-1.02 1.86,1.02, body extent -1,-0.65 1,0.65, height 0.61
LED0603-RD_GREEN [mm]
  rect 0.8x0.8 smd: 1(-0.799,-0.003) 2(0.799,0.003)
  silkscreen extent -1.49,-0.75 1.39,0.76, body extent -0.81,-0.41 0.81,0.41, height 0.6
QFN-64_MCU32_PROD [mm]
  rect 1x0.2 smd: 1(-3.95,3) 2(-3.95,2.6) 3(-3.95,2.2) 4(-3.95,1.8) 5(-3.95,1.4) 6(-3.95,1) 7(-3.95,0.6) 8(-3.95,0.2) 9(-3.95,-0.2) 10(-3.95,-0.6) 11(-3.95,-1) 12(-3.95,-1.4) 13(-3.95,-1.8) 14(-3.95,-2.2) 15(-3.95,-2.6) 16(-3.95,-3) 33(3.95,-3) 34(3.95,-2.6) 35(3.95,-2.2) 36(3.95,-1.8) 37(3.95,-1.4) 38(3.95,-1) 39(3.95,-0.6) 40(3.95,-0.2) 41(3.95,0.2) 42(3.95,0.6) 43(3.95,1) 44(3.95,1.4) 45(3.95,1.8) 46(3.95,2.2) 47(3.95,2.6) 48(3.95,3)
  rect 0.2x1 smd: 17(-3,-3.95) 18(-2.6,-3.95) 19(-2.2,-3.95) 20(-1.8,-3.95) 21(-1.4,-3.95) 22(-1,-3.95) 23(-0.6,-3.95) 24(-0.2,-3.95) 25(0.2,-3.95) 26(0.6,-3.95) 27(1,-3.95) 28(1.4,-3.95) 29(1.8,-3.95) 30(2.2,-3.95) 31(2.6,-3.95) 32(3,-3.95) 49(3,3.95) 50(2.6,3.95) 51(2.2,3.95) 52(1.8,3.95) 53(1.4,3.95) 54(1,3.95) 55(0.6,3.95) 56(0.2,3.95) 57(-0.2,3.95) 58(-0.6,3.95) 59(-1,3.95) 60(-1.4,3.95) 61(-1.8,3.95) 62(-2.2,3.95) 63(-2.6,3.95) 64(-3,3.95)
  rect 6x6 smd: 65(0,0)
  silkscreen extent -4.95,-4.08 4.08,4.08, body extent -4.01,-4.01 4.01,4.01, height 1.01
R0603 [mm]
  rect 0.806x0.864 smd: 1(-0.753,0) 2(0.753,0)
  silkscreen extent -1.39,-0.66 1.39,0.66, body extent -0.81,-0.4 0.81,0.41, height 0.45
SMB_L4.3-W3.6-LS5.4-RD [mm]
  rect 2.047x2.241 smd: 1(-2.591,0) 2(2.591,0)
  silkscreen extent -2.67,-1.91 2.26,1.91, body extent -2.7,-1.81 2.7,1.81, height 2.26
SMC_L7.1-W6.2-LS8.1-R-RD [mm] "SK86"
  rect 3.03x3.82 smd: 1(3.435,0) 2(-3.435,0)
  silkscreen extent -3.6,-3.11 3.6,3.11, body extent -4,-3 4,3, height 2.1
SOD-123_L2.7-W1.6-LS3.7-RD-1 [mm]
  rect 1.2x0.95 smd: 1(-1.7,0) 2(1.7,0)
  silkscreen extent -1.81,-0.98 1.35,0.98, body extent -1.92,-0.85 1.92,0.85, height 1.45
SOIC-8_L5.2-W5.2-P1.27-LS7.9-BL [mm]
  oval 0.63x2.25 smd: 1(-1.905,-3.53) 2(-0.635,-3.53) 3(0.635,-3.53) 4(1.905,-3.53) 5(1.905,3.53) 6(0.635,3.53) 7(-0.635,3.53) 8(-1.905,3.53)
  silkscreen extent -2.99,-3.69 2.74,2.75, body extent -2.61,-3.95 2.62,3.95, height 1.95
SOP-8_L4.9-W3.9-P1.27-LS6.0-BL-EP [mm]
  oval 0.6x1.8 smd: 1(-1.905,-2.772) 2(-0.635,-2.772) 3(0.635,-2.772) 4(1.905,-2.772) 5(1.905,2.772) 6(0.635,2.772) 7(-0.635,2.772) 8(-1.905,2.772)
  rect 2.29x2.29 smd: 9(0,0)
  round 0.61 hole 0.305: ""(-0.5,-0.5) ""(-0.5,0.5) ""(0.5,-0.5) ""(0.5,0.5)
  silkscreen extent -2.8,-2.92 2.53,1.52, body extent -2.45,-3.05 2.45,3.05, height 1.75
SOP-8_L5.0-W4.0-P1.27-LS6.0-BL [mm]
  oval 0.574x2.036 smd: 1(-1.905,-2.768) 2(-0.635,-2.768) 3(0.635,-2.768) 4(1.905,-2.768) 5(1.905,2.768) 6(0.635,2.768) 7(-0.635,2.768) 8(-1.905,2.768)
  silkscreen extent -2.79,-2.92 2.53,1.52, body extent -2.5,-3.1 2.5,3.1, height 1.8
SOT-23-3_L2.9-W1.3-P1.90-LS2.4-BR-CW [mm]
  rect 1.15x0.7 smd: 1(1.25,-0.95) 2(-1.25,0) 3(1.25,0.95)
  silkscreen extent -0.65,-1.46 0.76,1.46, body extent -1.45,-1.3 1.45,1.3, height 1.42
SOT-23-5_L3.0-W1.7-P0.95-LS2.8-BL [mm]
  rect 0.49x1.157 smd: 1(-0.95,-1.154) 2(0,-1.154) 3(0.95,-1.154)
  rect 0.49x1.175 smd: 4(0.95,1.154) 5(-0.95,1.154)
  silkscreen extent -1.8,-1.29 1.53,0.85, body extent -1.45,-1.51 1.45,1.51, height 1.25
SOT-23-6_L2.9-W1.6-P0.95-LS2.8-BL [mm]
  rect 0.532x1.072 smd: 1(-0.95,-1.149) 2(0,-1.149) 3(0.95,-1.149) 4(0.95,1.149) 5(0,1.149) 6(-0.95,1.149)
  silkscreen extent -1.82,-1.45 1.54,0.89, body extent -1.45,-1.41 1.45,1.41, height 1.65
SOT-25-5_L2.9-W1.6-P0.95-LS2.8-BL [mil]
  rect 24.5x43.5 smd: 1(-37.39,-51.18) 2(-0.02,-51.18) 3(37.39,-51.18) 4(37.39,51.18) 5(-37.39,51.18)
  silkscreen extent -75,-60 56,20, body extent -57,-55 57,55, height 49
TO-252-3_L6.5-W5.8-P4.58-BL [mm]
  rect 1.27x2.54 smd: 1(-2.288,-3.747) 3(2.288,-3.745)
  rect 5.4x6.1 smd: 2(-0.002,3.747)
  silkscreen extent -3.31,-1.46 3.3,5.9, body extent -3.17,-3.85 3.17,5.82, height 2.31
TSSOP-16_L5.0-W4.4-P0.65-LS6.4-BL [mm]
  oval 0.343x1.731 smd: 1(-2.275,-2.866) 2(-1.625,-2.866) 3(-0.975,-2.866) 4(-0.325,-2.866) 5(0.325,-2.866) 6(0.975,-2.866) 7(1.625,-2.866) 8(2.275,-2.866) 9(2.275,2.866) 10(1.625,2.866) 11(0.975,2.866) 12(0.325,2.866) 13(-0.325,2.866) 14(-0.975,2.866) 15(-1.625,2.866) 16(-2.275,2.866)
  silkscreen extent -3.05,-3.02 2.58,1.77, body extent -2.5,-3.2 2.5,3.2, height 1.05
USB-C-SMD_TYPE-C-16PIN-2MD-073 [mm]
  oval 1.1x1.9 hole 0.6 slot 1.3 at 90 deg: 13(-4.325,1.825) 14(4.325,1.825)
  oval 1.2x1.6 hole 0.6 slot 1 at 90 deg: 13(-4.325,-2.375) 14(4.325,-2.375)
  rect 0.55x1.1 smd: A1B12(-3.2,2.375) A4B9(-2.4,2.375) B1A12(3.2,2.375) B4A9(2.4,2.375)
  rect 0.3x1.1 smd: A5(-1.25,2.375) A6(-0.25,2.375) A7(0.25,2.375) A8(1.25,2.375) B5(1.75,2.375) B6(0.75,2.375) B7(-0.75,2.375) B8(-1.75,2.375)
  round 0.7 hole 0.7 unplated: ""(-2.89,1.305) ""(2.89,1.305)
  silkscreen extent -4.5,-4.97 4.57,0.6, body extent -4.47,-4.99 4.47,2.59, height 3.26

## Part data
C1 C7 C39 C42 C45 C48 C51 C54: library part 220UF35V8X12KM, JLCPCB Part Class="Extended Part", LCSC Part=C49304872, Manufacturer=Econd, Manufacturer Part Number=220uF35V8x12KM, Datasheet=https://www.lcsc.com/datasheet/C49304872.pdf, Source="JLCEDA/EasyEDA Official Library (https://easyeda.com, https://lceda.cn)", Supplier=LCSC, Supplier Part Number=C49304872
C2 C3 C9 C10 C14: library part CL31B475KBHNNNE, "4.7uF (475) ±10% 50V", JLCPCB Part Class="Extended Part", LCSC Part=C51205, Manufacturer=SAMSUNG, Datasheet=https://www.lcsc.com/datasheet/C51205.pdf, LCSC URL=https://lcsc.com/product-detail/Multilayer-Ceramic-Capacitors-MLCC-SMD-SMT_SAMSUNG_CL31B475KBHNNNE_4-7uF-475-10-50V_C51205.html, Manufacturer Part Number=CL31B475KBHNNNE, Source="JLCEDA/EasyEDA Official Library (https://easyeda.com, https://lceda.cn)", Supplier=LCSC, Supplier Part Number=C51205
C4 C5 C6 C8 C11 C12 C13 C15 C16 C17 C18 C19 C20 C21 C22 C23 C24 C25 C26 C27 C28 C29 C30 C31 C32 C33 C34 C35 C36 C37 C38 C40 C41 C43 C44 C46 C47 C49 C50 C52 C53 C55 C56: library part CL10B104KB8NNNC/0603, LCSC Part=C9900007620, Datasheet=https://www.lcsc.com/datasheet/C9900007620.pdf, Manufacturer Part Number=CL10B104KB8NNNC/0603, Source="JLCEDA/EasyEDA Official Library (https://easyeda.com, https://lceda.cn)", Supplier=LCSC, Supplier Part Number=C9900007620
DA1: JLCPCB Part Class="Extended Part", LCSC Part=C114425, Manufacturer=TI, Datasheet=https://www.lcsc.com/datasheet/C114425.pdf, LCSC URL=https://lcsc.com/product-detail/DC-DC-Converters_TI_TPS5450DDAR_TPS5450DDAR_C114425.html, Manufacturer Part Number=TPS5450DDAR, Source="JLCEDA/EasyEDA Official Library (https://easyeda.com, https://lceda.cn)", Supplier=LCSC, Supplier Part Number=C114425
DA2: library part AP2112K-3.3TRG1, JLCPCB Part Class="Extended Part", LCSC Part=C51118, Manufacturer=DIODES, Datasheet=https://www.lcsc.com/datasheet/C51118.pdf, LCSC URL=https://lcsc.com/product-detail/Low-Dropout-Regulators-LDO_DIODES_AP2112K-3-3TRG1_AP2112K-3-3TRG1_C51118.html, Manufacturer Part Number=AP2112K-3.3TRG1, Source="JLCEDA/EasyEDA Official Library (https://easyeda.com, https://lceda.cn)", Supplier=LCSC, Supplier Part Number=C51118
DA3: library part USBLC6-2SC6_C2827654, JLCPCB Part Class="Extended Part", LCSC Part=C2827654, Manufacturer="TECH PUBLIC", Datasheet=https://www.lcsc.com/datasheet/C2827654.pdf, Manufacturer Part Number=USBLC6-2SC6, Source="JLCEDA/EasyEDA Official Library (https://easyeda.com, https://lceda.cn)", Supplier=LCSC, Supplier Part Number=C2827654
DD1: library part "MIK32_K1948BK018 [vladkovalev3303]", Manufacturer=Mikron, Manufacturer Part Number=MCU32, EasyEDA Component=c698b5f0ec9d426a8ac2146e656034b7, Source="EasyEDA user library (author: vladkovalev3303), https://easyeda.com/component/c698b5f0ec9d426a8ac2146e656034b7"
DD2: library part "W25Q32JVSSIQ TR", JLCPCB Part Class="Extended Part", LCSC Part=C2441426, Manufacturer=WINBOND, Datasheet=https://www.lcsc.com/datasheet/C2441426.pdf, Manufacturer Part Number="W25Q32JVSSIQ TR", Source="JLCEDA/EasyEDA Official Library (https://easyeda.com, https://lceda.cn)", Supplier=LCSC, Supplier Part Number=C2441426
DD3: JLCPCB Part Class="Extended Part", LCSC Part=C506813, Datasheet=https://www.lcsc.com/datasheet/C506813.pdf, LCSC URL=https://lcsc.com/product-detail/USB-ICs_WCH-Jiangsu-Qin-Heng-CH340N_C506813.html, Manufacturer Part Number=CH340N, Source="JLCEDA/EasyEDA Official Library (https://easyeda.com, https://lceda.cn)", Supplier=LCSC, Supplier Part Number=C506813
DD4: library part 74HC138PW-Q100,118, JLCPCB Part Class="Extended Part", LCSC Part=C546575, Manufacturer=Nexperia, Datasheet=https://www.lcsc.com/datasheet/C546575.pdf, LCSC URL=https://lcsc.com/product-detail/presales_Nexperia-74HC138PW-Q100-118_C546575.html, Manufacturer Part Number=74HC138PW-Q100,118, Source="JLCEDA/EasyEDA Official Library (https://easyeda.com, https://lceda.cn)", Supplier=LCSC, Supplier Part Number=C546575
DD5: library part 74HC165PW,118, JLCPCB Part Class="Extended Part", LCSC Part=C80696, Manufacturer=Nexperia, Datasheet=https://www.lcsc.com/datasheet/C80696.pdf, LCSC URL=https://lcsc.com/product-detail/74-Series_NXP_74HC165PW_74HC165PW_C80696.html, Manufacturer Part Number=74HC165PW,118, Source="JLCEDA/EasyEDA Official Library (https://easyeda.com, https://lceda.cn)", Supplier=LCSC, Supplier Part Number=C80696
DD6: library part SN74LVC1G125DBVR, JLCPCB Part Class="Extended Part", LCSC Part=C23654, Manufacturer=TI, Datasheet=https://www.lcsc.com/datasheet/C23654.pdf, LCSC URL=https://lcsc.com/product-detail/74-Series_TI_SN74LVC1G125DBVR_SN74LVC1G125DBVR_C23654.html, Manufacturer Part Number=SN74LVC1G125DBVR, Source="JLCEDA/EasyEDA Official Library (https://easyeda.com, https://lceda.cn)", Supplier=LCSC, Supplier Part Number=C23654
F?: JLCPCB Part Class="Extended Part", LCSC Part=C142683, Manufacturer=Littelfuse, Datasheet=https://www.lcsc.com/datasheet/C142683.pdf, Manufacturer Part Number=0287010.PXCN, Source="JLCEDA/EasyEDA Official Library (https://easyeda.com, https://lceda.cn)", Supplier=LCSC, Supplier Part Number=C142683
FB1 FB2 FB3: library part BLM21PG221SN1D, "220Ohm ±25% @100MHz 2A", JLCPCB Part Class="Extended Part", LCSC Part=C85840, Manufacturer=muRata, Datasheet=https://www.lcsc.com/datasheet/C85840.pdf, LCSC URL=https://lcsc.com/product-detail/Ferrite-Beads-And-Chips_muRata_BLM21PG221SN1D_220R-25-at100MHz-2A_C85840.html, Manufacturer Part Number=BLM21PG221SN1D, Source="JLCEDA/EasyEDA Official Library (https://easyeda.com, https://lceda.cn)", Supplier=LCSC, Supplier Part Number=C85840
HL1 HL2 HL3 HL4 HL5: library part KT-0603GH, JLCPCB Part Class="Extended Part", LCSC Part=C9900005170, Datasheet=https://www.lcsc.com/datasheet/C9900005170.pdf, Manufacturer Part Number=KT-0603GH, Source="JLCEDA/EasyEDA Official Library (https://easyeda.com, https://lceda.cn)", Supplier=LCSC, Supplier Part Number=C9900005170
L1: library part SWPA8040S220MT, "22uH ±20%", JLCPCB Part Class="Extended Part", LCSC Part=C15857, Manufacturer=Sunlord, Datasheet=https://www.lcsc.com/datasheet/C15857.pdf, LCSC URL=https://lcsc.com/product-detail/Power-Inductors_22uH-20_C15857.html, Manufacturer Part Number=SWPA8040S220MT, Source="JLCEDA/EasyEDA Official Library (https://easyeda.com, https://lceda.cn)", Supplier=LCSC, Supplier Part Number=C15857
R1 R2 R3 R4 R5 R6 R7 R8 R9 R10 R11 R12 R13 R14 R15 R16 R17 R18 R19 R20 R21 R22 R23 R24 R25 R26 R27 R28 R29 R30 R31 R32 R33 R34 R35 R36 R37 R38 R39 R40 R41 R42 R43 R44 R45 R46 R47 R48 R49 R50 R51 R52: library part 0603WAF1002T5E, "10KOhm (1002) ±1%", JLCPCB Part Class="Basic Part", LCSC Part=C25804, Manufacturer=UNI-ROYAL, Datasheet=https://www.lcsc.com/datasheet/C25804.pdf, LCSC URL=https://lcsc.com/product-detail/Chip-Resistor-Surface-Mount-UniOhm_10KR-1002-1_C25804.html, Manufacturer Part Number=0603WAF1002T5E, Source="JLCEDA/EasyEDA Official Library (https://easyeda.com, https://lceda.cn)", Supplier=LCSC, Supplier Part Number=C25804
SW?: JLCPCB Part Class="Extended Part", LCSC Part=C110153, Datasheet=https://www.lcsc.com/datasheet/C110153.pdf, LCSC URL=https://lcsc.com/product-detail/Tactile-Switches_Button6-6-5_C110153.html, Manufacturer Part Number=K2-1102DP-C4SW-04, Source="JLCEDA/EasyEDA Official Library (https://easyeda.com, https://lceda.cn)", Supplier=LCSC, Supplier Part Number=C110153
VD1: library part BZT52C12V, JLCPCB Part Class="Extended Part", LCSC Part=C5182293, Manufacturer=JUXING, Datasheet=https://www.lcsc.com/datasheet/C5182293.pdf, Manufacturer Part Number=BZT52C12V, Source="JLCEDA/EasyEDA Official Library (https://easyeda.com, https://lceda.cn)", Supplier=LCSC, Supplier Part Number=C5182293
VD2: library part SMBJ24A_C224017, JLCPCB Part Class="Extended Part", LCSC Part=C224017, Manufacturer=Littelfuse, Datasheet=https://www.lcsc.com/datasheet/C224017.pdf, LCSC URL=https://lcsc.com/product-detail/Others_Littelfuse_SMBJ24A_Littelfuse-SMBJ24A_C224017.html, Manufacturer Part Number=SMBJ24A, Source="JLCEDA/EasyEDA Official Library (https://easyeda.com, https://lceda.cn)", Supplier=LCSC, Supplier Part Number=C224017
VD3 VD4 VD5: JLCPCB Part Class="Extended Part", LCSC Part=C64338, Manufacturer=MDD, Manufacturer Part Number=SK86C, Datasheet=https://www.lcsc.com/datasheet/C64338.pdf, LCSC URL=https://lcsc.com/product-detail/Schottky-Barrier-Diodes-SBD_SK86_C64338.html, Source="JLCEDA/EasyEDA Official Library (https://easyeda.com, https://lceda.cn)", Supplier=LCSC, Supplier Part Number=C64338
VT1: JLCPCB Part Class="Extended Part", LCSC Part=C77993, Manufacturer=AOS, Manufacturer Part Number=AOD4185L, Datasheet=https://www.lcsc.com/datasheet/C77993.pdf, LCSC URL=https://lcsc.com/product-detail/MOSFET_AOS_AOD4185_AOD4185_C77993.html, Source="JLCEDA/EasyEDA Official Library (https://easyeda.com, https://lceda.cn)", Supplier=LCSC, Supplier Part Number=C77993
VT2: library part SI2302DDS-T1-GE3-HXY, JLCPCB Part Class="Extended Part", LCSC Part=C22367242, Manufacturer="HXY MOSFET", Manufacturer Part Number=Si2302DDS-T1-GE3-HXY, Datasheet=https://www.lcsc.com/datasheet/C22367242.pdf, Source="JLCEDA/EasyEDA Official Library (https://easyeda.com, https://lceda.cn)", Supplier=LCSC, Supplier Part Number=C22367242
XP2 XP3 XP4 XP5 XP8 XP21 XP22 XP24 XP25 XP27 XP28 XP30 XP31 XP33 XP34 XP36 XP37: library part PZ254V-11-02P, JLCPCB Part Class="Extended Part", LCSC Part=C492401, Manufacturer=XFCN, Datasheet=https://www.lcsc.com/datasheet/C492401.pdf, LCSC URL=https://lcsc.com/product-detail/New-Arrivals_XFCN-PZ254V-11-02P_C492401.html, Manufacturer Part Number=PZ254V-11-02P, Source="JLCEDA/EasyEDA Official Library (https://easyeda.com, https://lceda.cn)", Supplier=LCSC, Supplier Part Number=C492401
XP6: library part PZ254V-11-08P, JLCPCB Part Class="Extended Part", LCSC Part=C492407, Manufacturer=XFCN, Datasheet=https://www.lcsc.com/datasheet/C492407.pdf, LCSC URL=https://lcsc.com/product-detail/New-Arrivals_XFCN-PZ254V-11-08P_C492407.html, Manufacturer Part Number=PZ254V-11-08P, Source="JLCEDA/EasyEDA Official Library (https://easyeda.com, https://lceda.cn)", Supplier=LCSC, Supplier Part Number=C492407
XP7 XP9 XP10 XP11 XP12 XP13 XP14: library part PZ254V-11-03P_C2937625, JLCPCB Part Class="Extended Part", LCSC Part=C2937625, Manufacturer=XFCN, Manufacturer Part Number=PZ254V-11-03P, Datasheet=https://www.lcsc.com/datasheet/C2937625.pdf, Source="JLCEDA/EasyEDA Official Library (https://easyeda.com, https://lceda.cn)", Supplier=LCSC, Supplier Part Number=C2937625
XP15 XP16 XP17 XP18 XP19 XP20: library part PZ254V-11-05P, JLCPCB Part Class="Extended Part", LCSC Part=C492404, Manufacturer=XFCN, Datasheet=https://www.lcsc.com/datasheet/C492404.pdf, LCSC URL=https://lcsc.com/product-detail/New-Arrivals_XFCN-PZ254V-11-05P_C492404.html, Manufacturer Part Number=PZ254V-11-05P, Source="JLCEDA/EasyEDA Official Library (https://easyeda.com, https://lceda.cn)", Supplier=LCSC, Supplier Part Number=C492404
XP23 XP26 XP29 XP32 XP35 XP38: library part PZ254V-11-04P_C2691448, JLCPCB Part Class="Extended Part", LCSC Part=C2691448, Manufacturer=XFCN, Manufacturer Part Number=PZ254V-11-04P, Datasheet=https://www.lcsc.com/datasheet/C2691448.pdf, Source="JLCEDA/EasyEDA Official Library (https://easyeda.com, https://lceda.cn)", Supplier=LCSC, Supplier Part Number=C2691448
XS1: library part "TYPE-C 16PIN 2MD(073)", JLCPCB Part Class="Extended Part", LCSC Part=C2765186, Manufacturer="SHOU HAN", Datasheet=https://www.lcsc.com/datasheet/C2765186.pdf, Manufacturer Part Number="TYPE-C 16PIN 2MD(073)", Source="JLCEDA/EasyEDA Official Library (https://easyeda.com, https://lceda.cn)", Supplier=LCSC, Supplier Part Number=C2765186
XS2 XS3 XS4 XS5 XS6 XS7 XS8 XS9 XS10 XS11 XS12 XS13: library part PZ254V-11-08P-A40, JLCPCB Part Class="Extended Part", LCSC Part=C42419915, Manufacturer=XFCN, Datasheet=https://www.lcsc.com/datasheet/C42419915.pdf, Manufacturer Part Number=PZ254V-11-08P-A40, Source="JLCEDA/EasyEDA Official Library (https://easyeda.com, https://lceda.cn)", Supplier=LCSC, Supplier Part Number=C42419915
XT1 XT2 XT3 XT4 XT5 XT6 XT7 XT8 XT9 XT10 XT11 XT12 XT13: library part KF350-3.5-2P, JLCPCB Part Class="Extended Part", LCSC Part=C474892, Manufacturer=KEFA, Datasheet=https://www.lcsc.com/datasheet/C474892.pdf, LCSC URL=https://lcsc.com/product-detail/New-Quadratic-Unclassified-Data_Cixi-Kefa-Elec-KF350-3-5-2P_C474892.html, Manufacturer Part Number=KF350-3.5-2P, Source="JLCEDA/EasyEDA Official Library (https://easyeda.com, https://lceda.cn)", Supplier=LCSC, Supplier Part Number=C474892
ZQ1: library part X322532MOB4SI, "YSX321SL 32MHZ 12PF 10PPM -40~+85", JLCPCB Part Class="Extended Part", LCSC Part=C9009, Manufacturer=YXC, Datasheet=https://www.lcsc.com/datasheet/C9009.pdf, LCSC URL=https://lcsc.com/product-detail/SMD-Crystals_YSX321SL-32MHZ-12PF-10PPM-40-85_C9009.html, Manufacturer Part Number=X322532MOB4SI, Source="JLCEDA/EasyEDA Official Library (https://easyeda.com, https://lceda.cn)", Supplier=LCSC, Supplier Part Number=C9009
ZQ2: library part Q13FC1350000400, "32.768KHz ±20ppm 12.5pF", JLCPCB Part Class="Basic Part", LCSC Part=C32346, Manufacturer=EPSON, Manufacturer Part Number=Q13FC13500004, Datasheet=https://www.lcsc.com/datasheet/C32346.pdf, LCSC URL=https://lcsc.com/product-detail/SMD-Crystals_EPSON_Q13FC1350000400_32-768KHz-20ppm-12-5pF_C32346.html, Source="JLCEDA/EasyEDA Official Library (https://easyeda.com, https://lceda.cn)", Supplier=LCSC, Supplier Part Number=C32346

## Via types
v1: diameter 0.6, hole 0.3, Top Layer to Bottom Layer, 115 vias
v2: diameter 1.2, hole 0.6, Top Layer to Bottom Layer, 7 vias
v3: diameter 1.27, hole 0.711, Top Layer to Bottom Layer, 3 vias

## Nets (pads, with @x,y where several pads share a name; then routed paths per layer and width w, separated by ;. In a path a pad name is that pad's centre, name@x,y a point inside that pad or via, vN(x,y) a via of type N, cw(c..) or ccw(c..) an arc to the next point about the centre after c; other vN are vias at no path point)
+3V3: C10.1 C11.1 C12.1 C13.1 C14.1 C27.1 C28.1 C29.1 C30.1 C31.1 C41.1 C44.1 C47.1 C50.1 C53.1 C56.1 DA2.5 DD1.5 DD1.8 DD1.10 DD1.20 DD1.52 DD2.8 DD3.5 DD3.8 DD4.16 DD5.16 DD6.5 FB1.1 R7.1 R8.2 R10.2 R13.2 R29.2 R30.2 R31.2 R32.2 R33.2 R34.2 XP4.2 XP6.1 XP15.1 XP16.1 XP17.1 XP18.1 XP19.1 XP20.1 XP21.2 XP22.2 XP24.2 XP25.2 XP27.2 XP28.2 XP30.2 XP31.2 XP33.2 XP34.2 XP36.2 XP37.2 XS3.7 XS5.7 XS7.7 XS9.7 XS11.7 XS13.7 | length 128.9
  Top Layer w0.2: C11.1@35.45,76.25 35.741,76.541 35.741,77.113 35.859,77.23 v1(36.71,77.23) 38.204,77.23 39.011,76.424 39.496,76.424 39.619,76.3 40.466,76.3 DD1.20@41.237,76.3 ; DD1.10@44.587,78.45 44.587,79.387 44.825,79.625 45.1,79.625 45.387,79.625 DD1.8@45.387,78.45 ; 45.846,82.246 46.1,82.5 47.8,82.5 ; DD1.5@46.587,78.45 46.587,79.074 46.587,79.587 46.587,79.853 48.134,81.4 49.243,81.4 C14.1@49.75,81.907 ; DD1.52@49.137,72.7 49.761,72.7 C12.1@51.49,72.7 ; C12.1@51.7,72.65 51.85,72.8 v1(52.55,72.8)
  Top Layer w0.3: DD2.8@39.655,58.72 39.655,58.58 DD2.8@39.807,58.428 ; C28.1@42.25,55 42.25,54.95 42.595,54.605 DD3.8@42.595,52.268 ; C28.1@42.45,55 v1(43.5,55) ; v1(43.45,58.45) v1@43.531,58.45 ; v1@43.519,54.981 44.423,54.981 DD3.5@46.405,52.999 ; 45.1,79.625 45.1,81.055 45.846,81.801 45.846,82.246 ; C10.1@47.075,57.457 C10.1@47.207,57.325 ; 47.8,82.5 48.86,82.5 49.158,82.5 C14.1@49.725,81.932 ; C30.1@48.7,108.25 49.493,108.25 50.772,106.971 50.772,106.545 50.792,106.525 DD5.16@50.866,106.525 ; DD4.16@50.866,96.275 50.874,96.283 52.033,96.283 52.25,96.5 52.25,97.4 ; v1(50.925,97.45) 50.975,97.4 52.25,97.4 ; C29.1@52.25,98.3 52.25,97.4
  Top Layer w0.4: C13.1@51.925,82.025 C13.1@52,82.1 ; XS13.7@65.93,51.06 XS13.7@65.99,51.12 ; C56.1@66.01,53.81 C56.1@65.95,53.75 65.975,53.725 67.275,53.725 v1(67.3,53.7) ; XS3.7@78.62,96.94 XS3.7@78.71,96.85 ; C41.1@78.71,94.34 C41.1@78.8,94.25 ; C53.1@91.215,53.765 C53.1@91.2,53.75 91.225,53.725 91.285,53.725 92.475,53.725 v1(92.5,53.7) ; XS11.7@91.27,51.06 XS11.7@91.285,51.075 ; XS5.7@103.96,96.93 XS5.7@103.97,96.94 ; XS9.7@116.61,51.12 XS9.7@116.67,51.06 ; C50.1@116.7,53.75 116.725,53.725 118.075,53.725 v1(118.1,53.7) ; XS7.7@129.37,96.94 XS7.7@129.41,96.9
  Top Layer w0.5: R10.2@28.497,87.25 28.497,85.423 27.98,84.906 XP4.2@27.98,84.5 28.267,84.213 28.267,83.233 29,82.5 30.069,82.5 30.5,82.069 R8.2@30.5,81.003 ; DD2.8@39.807,58.428 C27.1@41.977,58.428 ; 40.734,108.327 40.888,108.48 40.888,108.857 41.18,109.15 48.257,109.15 48.55,108.857 48.55,108.4 C30.1@48.7,108.25 ; R13.2@42,60.497 C27.1@42,58.45 v1(43.45,58.45) ; R7.1@43.497,42 43.497,39.76 45.678,37.579 45.678,36.982 XP6.1@46.16,36.5 ; v1(43.5,55) v1@43.519,54.981 ; v1@43.531,58.45 44.24,57.741 46.791,57.741 C10.1@47.075,57.457 ; C31.1@44.5,98.05 DD6.5@46.846,98.05 ; DD3.5@46.405,52.268 DD3.5@46.405,52.999 ; C10.1@47.207,57.325 DA2.5@50.25,57.325 ; C14.1@49.725,81.932 v1(49.725,83.75) ; C14.1@49.75,81.907 49.846,82.004 51.854,82.004 C13.1@51.95,82.1 ; v1(54.311,80.115) 54.313,80.117 55.661,80.117 FB1.1@55.663,80.118 ; XP21.2@63.203,77.363 XP21.2@63.35,77.51 ; XS13.7@65.99,51.12 C56.1@65.99,53.69 ; v1(70.7,80.1) 70.719,80.081 71.416,80.081 R29.2@71.5,79.997 ; R34.2@73,68.253 73.025,68.228 73.875,68.228 v1(73.894,68.209) ; v1(77.676,94.2) 77.703,94.2 77.753,94.25 C41.1@78.8,94.25 ; C41.1@78.71,94.34 XS3.7@78.71,96.85 ; XS11.7@91.285,51.075 C53.1@91.285,53.725 ; R30.2@96.5,80.242 96.623,80.119 97.381,80.119 v1(97.4,80.1) ; R33.2@98.5,68.253 98.504,68.257 99.404,68.257 v1(99.408,68.261) ; v1(102.873,94.102) 102.9,94.102 103.002,94 C44.1@104.05,94 ; C44.1@103.96,94.26 XS5.7@103.96,96.93 ; XS9.7@116.61,51.12 C50.1@116.61,53.69 ; XP28.2@117.1,77.78 XP28.2@117.247,77.927 ; R31.2@121.925,80.172 R31.2@122,80.247 122.002,80.245 122.921,80.245 v1(122.923,80.243) ; v1(123.1,68.2) 123.119,68.219 123.966,68.219 R32.2@124,68.253 ; v1(128.315,94.236) 128.322,94.243 129.543,94.243 C47.1@129.55,94.25 ; C47.1@129.41,94.29 XS7.7@129.41,96.9
  Bottom Layer w0.5: XP24.2@88.697,77.533 XP25.2@91.697,77.533 ; XP34.2@103.488,70.49 XP33.2@106.488,70.49 ; XP27.2@114.1,77.78 XP28.2@117.1,77.78 ; XP31.2@128.75,70.49 XP30.2@131.75,70.49
  other v1: 45.673,98.05 44.533,109.15
+3V3A: C19.1 C20.1 DD1.62 FB1.2 | length 10.3
  Top Layer w0.2: DD1.62@49.137,76.7 50.468,76.7 50.769,77 51.716,77 51.758,77.042 51.758,77.044 cw(c51.958,77.049) 51.758,77.056
  Top Layer w0.4: 51.758,77.056 53.756,77.056 54.623,77.923 55.4,77.923 FB1.2@55.663,78.186 ; 51.85,77.056 C19.1@51.85,80.175
+5V: C9.1 DA2.1 DA2.3 VD4.2 VD5.2 XP9.1 XP10.1 XP11.1 XP12.1 XP13.1 XP14.1 | length 206.4
  Top Layer w0.5: DA2.1@52.85,57.325 53.825,57.325 54.2,57.7 54.2,59.225 ; DA2.3@52.85,59.225 54.2,59.225 ; VD5.2@56.25,51.61 VD5.2@56.66,51.2 ; C9.1@56.25,57.432 C9.1@56.268,57.432 ; C9.1@56.368,57.55 56.368,58.632 55.775,59.225 55.093,59.225 54.875,59.225 54.2,59.225
  Top Layer w1: VD5.2@56.25,51.61 56.25,54.521 ; C9.1@56.25,57.432 56.25,54.521 ; XP14.1@63.391,67.55 61,65.159 61,56.75 58.771,54.521 56.25,54.521 ; XP11.1@131.9,80.625 132.073,80.452 136.169,80.452 137.685,78.936 137.685,73.565 143.34,67.91 145.42,67.91 VD4.2@146.435,66.895 ; VD4.2@146.435,66.5 VD4.2@146.787,66.852
  Bottom Layer w1: XP14.1@63.391,67.55 65.541,65.4 88.725,65.4 ; XP9.1@81.19,80.625 81.472,80.625 81.54,80.693 84.443,80.693 86.27,82.52 106.505,82.52 ; XP13.1@88.725,67.55 88.725,65.4 ; XP10.1@106.505,80.625 106.505,82.52 ; XP12.1@114.127,67.55 114.127,65.4 ; XP11.1@131.9,80.625 131.939,80.664 134.375,80.664 ; 88.725,65.4 114.127,65.4 ; 106.505,82.52 133.519,82.52 134.375,81.664 134.375,80.664 ; 114.127,65.4 133.789,65.4 134.375,65.986 134.375,80.664
+5V_DC: C7.1 C8.1 FB2.1 FB3.1 L1.2 R4.1 R6.1 VD4.1 | length 55.4
  Top Layer w0.5: L1.2@140.422,48 140.422,43.078 144.253,39.247 R6.1@144.253,38 R4.1@147.247,38 147.223,38.023 147.223,39.977 C8.1@147.2,40
  Top Layer w1: 139.75,63 140,62.75 147.5,62.75 149.5,64.75 FB3.1@155.5,64.75 FB2.1@155.5,68
  Top Layer w2: VD4.1@139.565,66.5 139.75,66.315 139.75,63 C7.1@139.75,57.75 140.422,57.078 L1.2@140.422,48
+24V: C1.1 C2.1 C3.1 C4.1 C39.1 C40.1 C42.1 C43.1 C45.1 C46.1 C48.1 C49.1 C51.1 C52.1 C54.1 C55.1 DA1.7 R2.1 VD1.1 VD2.1 VT1.3 XS3.1 XS5.1 XS7.1 XS9.1 XS11.1 XS13.1 | length 46.3
  Top Layer w0.5: XS9.1@131.91,51.06 131.95,51.1 C49.1@131.95,53.75 ; v2(152.25,90.75) 152.25,90.561 152.7,90.111 R2.1@152.7,87.153
  Top Layer w1: C40.1@63.3,94.25 63.3,96.86 XS3.1@63.38,96.94 ; XS13.1@81.17,51.06 81.2,51.09 C55.1@81.2,53.75 ; XS5.1@88.73,96.94 88.8,96.87 C43.1@88.8,94.25 ; C52.1@106.45,53.75 106.45,51.12 XS11.1@106.51,51.06 ; C46.1@114.05,94.25 114.05,96.86 XS7.1@114.13,96.94 ; VD1.1@142.9,90.3 146.75,90.3 147.038,90.588 ; C2.1@153.657,60.75 C2.1@153.709,60.699 ; C3.1@153.709,57.864 153.711,57.862 C3.1@153.898,57.862
  Top Layer w3: VT1.3@147.038,94.255 147.038,90.588 ; VD2.1@147.095,84.463 147.095,90.531 147.038,90.588 ; v2@152.25,90.588 147.038,90.588 ; v2(152.25,90.75) 152.943,90.75 154.7,92.507 C1.1@154.7,96.05
  other v2: 148.75,90.75 150.5,90.75
  other v3: 153.5,50.25 153.5,52.5 153.5,55
BOOT0: DD1.17 R9.1 XP4.1 | length 14.8
  Top Layer w0.2: v1(39.47,78.53) 39.578,78.53 40.608,77.5 DD1.17@41.237,77.5
  Top Layer w0.4: R9.1@33.25,84.5 33.25,83.687 33.683,83.254 v1(35.874,83.254)
  Top Layer w0.5: XP4.1@30.52,84.5 R9.1@33.25,84.5
  Bottom Layer w0.4: v1(35.874,83.254) 35.874,82.126 v1(39.47,78.53)
BOOT1: DD1.18 R10.1 XP5.1 | length 25.4
  Top Layer w0.2: XP5.1@30.003,89.233 XP5.1@30.52,89.75 ; v1(32.05,78.714) 32.068,78.732 38.419,78.732 40.051,77.1 40.466,77.1 DD1.18@41.237,77.1
  Top Layer w0.5: R10.1@30.003,87.25 XP5.1@30.003,89.233
  Bottom Layer w0.4: XP5.1@30.52,89.75 32.115,88.155 32.115,78.92 32.088,78.894 32.088,78.752 v1(32.05,78.714)
  Bottom Layer w0.5: XP5.1@29.77,89 XP5.1@30.52,89.75
CS_ENC1: DD4.15 R35.2 | length 57.8
  Top Layer w0.3: DD4.15@50.866,95.625 53.804,95.625 54.174,95.255 54.422,95.255 54.61,95.443 55.193,95.443 v1(55.25,95.5) ; R35.2@78.5,73.247 84.247,73.247 85.3,74.3 85.3,86.424 85,86.724 v1(85,86.75)
  Bottom Layer w0.3: v1(55.25,95.5) 63.55,87.2 84.55,87.2 v1(85,86.75)
CS_ENC2: DD4.14 R38.2 | length 87.5
  Top Layer w0.3: DD4.14@50.866,94.975 53.616,94.975 53.986,94.605 60.375,94.605 62.28,92.7 107.765,92.7 115.28,85.185 115.28,83.295 115.075,83.09 113.84,83.09 112.406,81.656 112.406,78.77 106.882,73.247 R38.2@104,73.247
CS_ENC3: DD4.13 R41.2 | length 110.4
  Top Layer w0.3: DD4.13@50.866,94.325 53.559,94.325 53.779,94.105 60.145,94.105 62.5,91.75 v1(64.75,91.75)
  Top Layer w0.4: R41.2@128.5,73.247 134.588,73.247 v1(136.462,71.373)
  Bottom Layer w0.4: v1(64.75,91.75) 127.25,91.75 136.44,82.56 136.44,71.395 v1(136.462,71.373)
CS_ENC4: DD4.12 R44.2 | length 103.6
  Top Layer w0.3: DD4.12@50.866,93.675 50.858,93.683 49.897,93.683 49.65,93.93 49.65,97.228 50.969,98.547 50.969,99.764 51.903,100.698 54.613,100.698 55.366,100.698 62.864,93.2 116.1,93.2 122.9,86.4 122.9,83.929 124.322,82.507 124.577,82.507 124.782,82.302 124.782,81.205 124.577,81 121.423,81 121,80.577 121,78.753 117.282,75.035 117.282,75.007 117.029,74.753 R44.2@117,74.753
CS_ENC5: DD4.11 R47.2 | length 54.6
  Top Layer w0.3: DD4.11@50.866,93.025 58.725,93.025 v1(58.75,93) ; v1(86.25,86.75) 86.25,75.85 87.347,74.753 R47.2@91.5,74.753
  Bottom Layer w0.3: v1(58.75,93) 64.05,87.7 85.3,87.7 v1(86.25,86.75)
CS_ENC6: DD4.10 R50.2 | length 29.9
  Top Layer w0.3: DD4.10@50.866,92.375 54.696,92.375 60,87.071 v1(60,77.651) ; v1(59.75,74.85) 59.798,74.802 65.952,74.802 R50.2@66,74.753
  Bottom Layer w0.3: v1(59.75,74.85) 59.75,74.931 60,75.181 v1(60,77.651)
DIR1: DD1.21 XS2.8 | length 49.3
  Top Layer w0.2: v1(38.251,76.224) 38.327,76.147 38.721,76.147 38.845,76.024 39.33,76.024 39.454,75.9 DD1.21@41.237,75.9
  Bottom Layer w0.5: v1(38.251,76.224) 38.27,76.243 39.243,76.243 45.125,82.125 79.045,82.125 XS2.8@81.16,84.24
DIR2: DD1.23 XS4.8 | length 81.2
  Top Layer w0.2: v1(36.478,75.9) 37.154,75.224 38.999,75.224 39.122,75.1 40.831,75.1 DD1.23@41.237,75.1
  Bottom Layer w0.5: v1(36.478,75.9) 37.552,76.974 38.974,76.974 44.825,82.825 64.201,82.825 64.63,83.254 64.63,85.197 64.923,85.49 86.74,85.49 87.25,86 104.75,86 XS4.8@106.51,84.24
DIR3: DD1.54 XS6.8 | length 95
  Top Layer w0.2: DD1.54@49.137,73.5 49.596,73.5 50.71,73.5 51.81,74.6 54.75,74.6 55.25,74.1 v1(55.25,74)
  Top Layer w0.3: 130.59,76.237 130.6,76.247 ; 130.6,75.2 130.6,82.93
  Top Layer w0.5: 130.59,76.237 130.59,75.21 v1@130.981,74.819 ; 130.6,82.93 XS6.8@131.91,84.24
  Bottom Layer w0.3: v1(55.25,74) 55.6,73.65 71.248,73.65 71.898,73 72.146,73 129.2,73 v1(131,74.8)
DIR4: DD1.27 XS8.8 | length 93.7
  Top Layer w0.2: v1(36.29,73.437) 36.896,73.437 37.109,73.224 40.171,73.224 40.447,73.5 40.581,73.5 DD1.27@41.237,73.5
  Bottom Layer w0.2: 34.1,73.1 34.6,73.6 35.849,73.6 35.935,73.514 36.213,73.514 v1(36.29,73.437)
  Bottom Layer w0.5: 34.1,73.1 34.1,72.2 35.693,70.607 35.999,70.607 36.001,70.604 37.741,70.604 37.744,70.607 54.775,70.607 63.572,61.81 112.18,61.81 XS8.8@114.13,63.76
DIR5: DD1.28 XS10.8 | length 64.4
  Top Layer w0.2: v1(35.6,73) 35.677,72.923 35.955,72.923 36.055,72.824 40.337,72.824 40.613,73.1 40.747,73.1 DD1.28@41.237,73.1
  Bottom Layer w0.5: v1(35.6,73) 35.6,72.973 36.124,72.449 36.124,72.392 36.492,72.024 55.526,72.024 62.54,65.01 63.908,65.01 64.66,64.258 64.66,63.262 65.412,62.51 87.397,62.51 88.647,63.76 XS10.8@88.73,63.76
DIR6: DD1.30 XS12.8 | length 38.8
  Top Layer w0.2: v1(34.85,72.639) 34.958,72.639 35.298,72.3 40.379,72.3 DD1.30@41.228,72.3
  Bottom Layer w0.5: v1(34.85,72.639) 34.85,72.612 34.9,72.562 34.9,72.555 35.735,71.72 35.769,71.72 36.182,71.307 55.143,71.307 62.48,63.97 63.18,63.97 XS12.8@63.39,63.76
DRV_EN: DD1.26 R20.1 | length 28.6
  Top Layer w0.2: v1(36.761,74.1) 36.799,74.1 37.275,73.624 39.874,73.624 40.15,73.9 40.666,73.9 40.837,73.9 DD1.26@41.237,73.9
  Top Layer w0.3: R20.1@30.003,92.75 30.015,92.738 31.157,92.738 33.458,90.437 33.993,90.437 v1(34.05,90.38)
  Bottom Layer w0.3: v1(34.05,90.38) 34.05,90.299 33.9,90.149 33.9,74.774 34.574,74.1 v1(36.761,74.1)